# Altium PCB 0060631C.PcbDoc (part 1 of 7)
Units mil, origin at the board's own origin, x right, y up, seen from the top; angles counter-clockwise.
Board outline 5480 x 8249 mil, 6 copper layers (Top Layer, Mid-Layer 1, Mid-Layer 2, Internal Plane 1, Internal Plane 2, Bottom Layer); 514 components, 269 nets, 1375 pads, 1334 vias.
Unrouted connection lines stored in the file: 126.
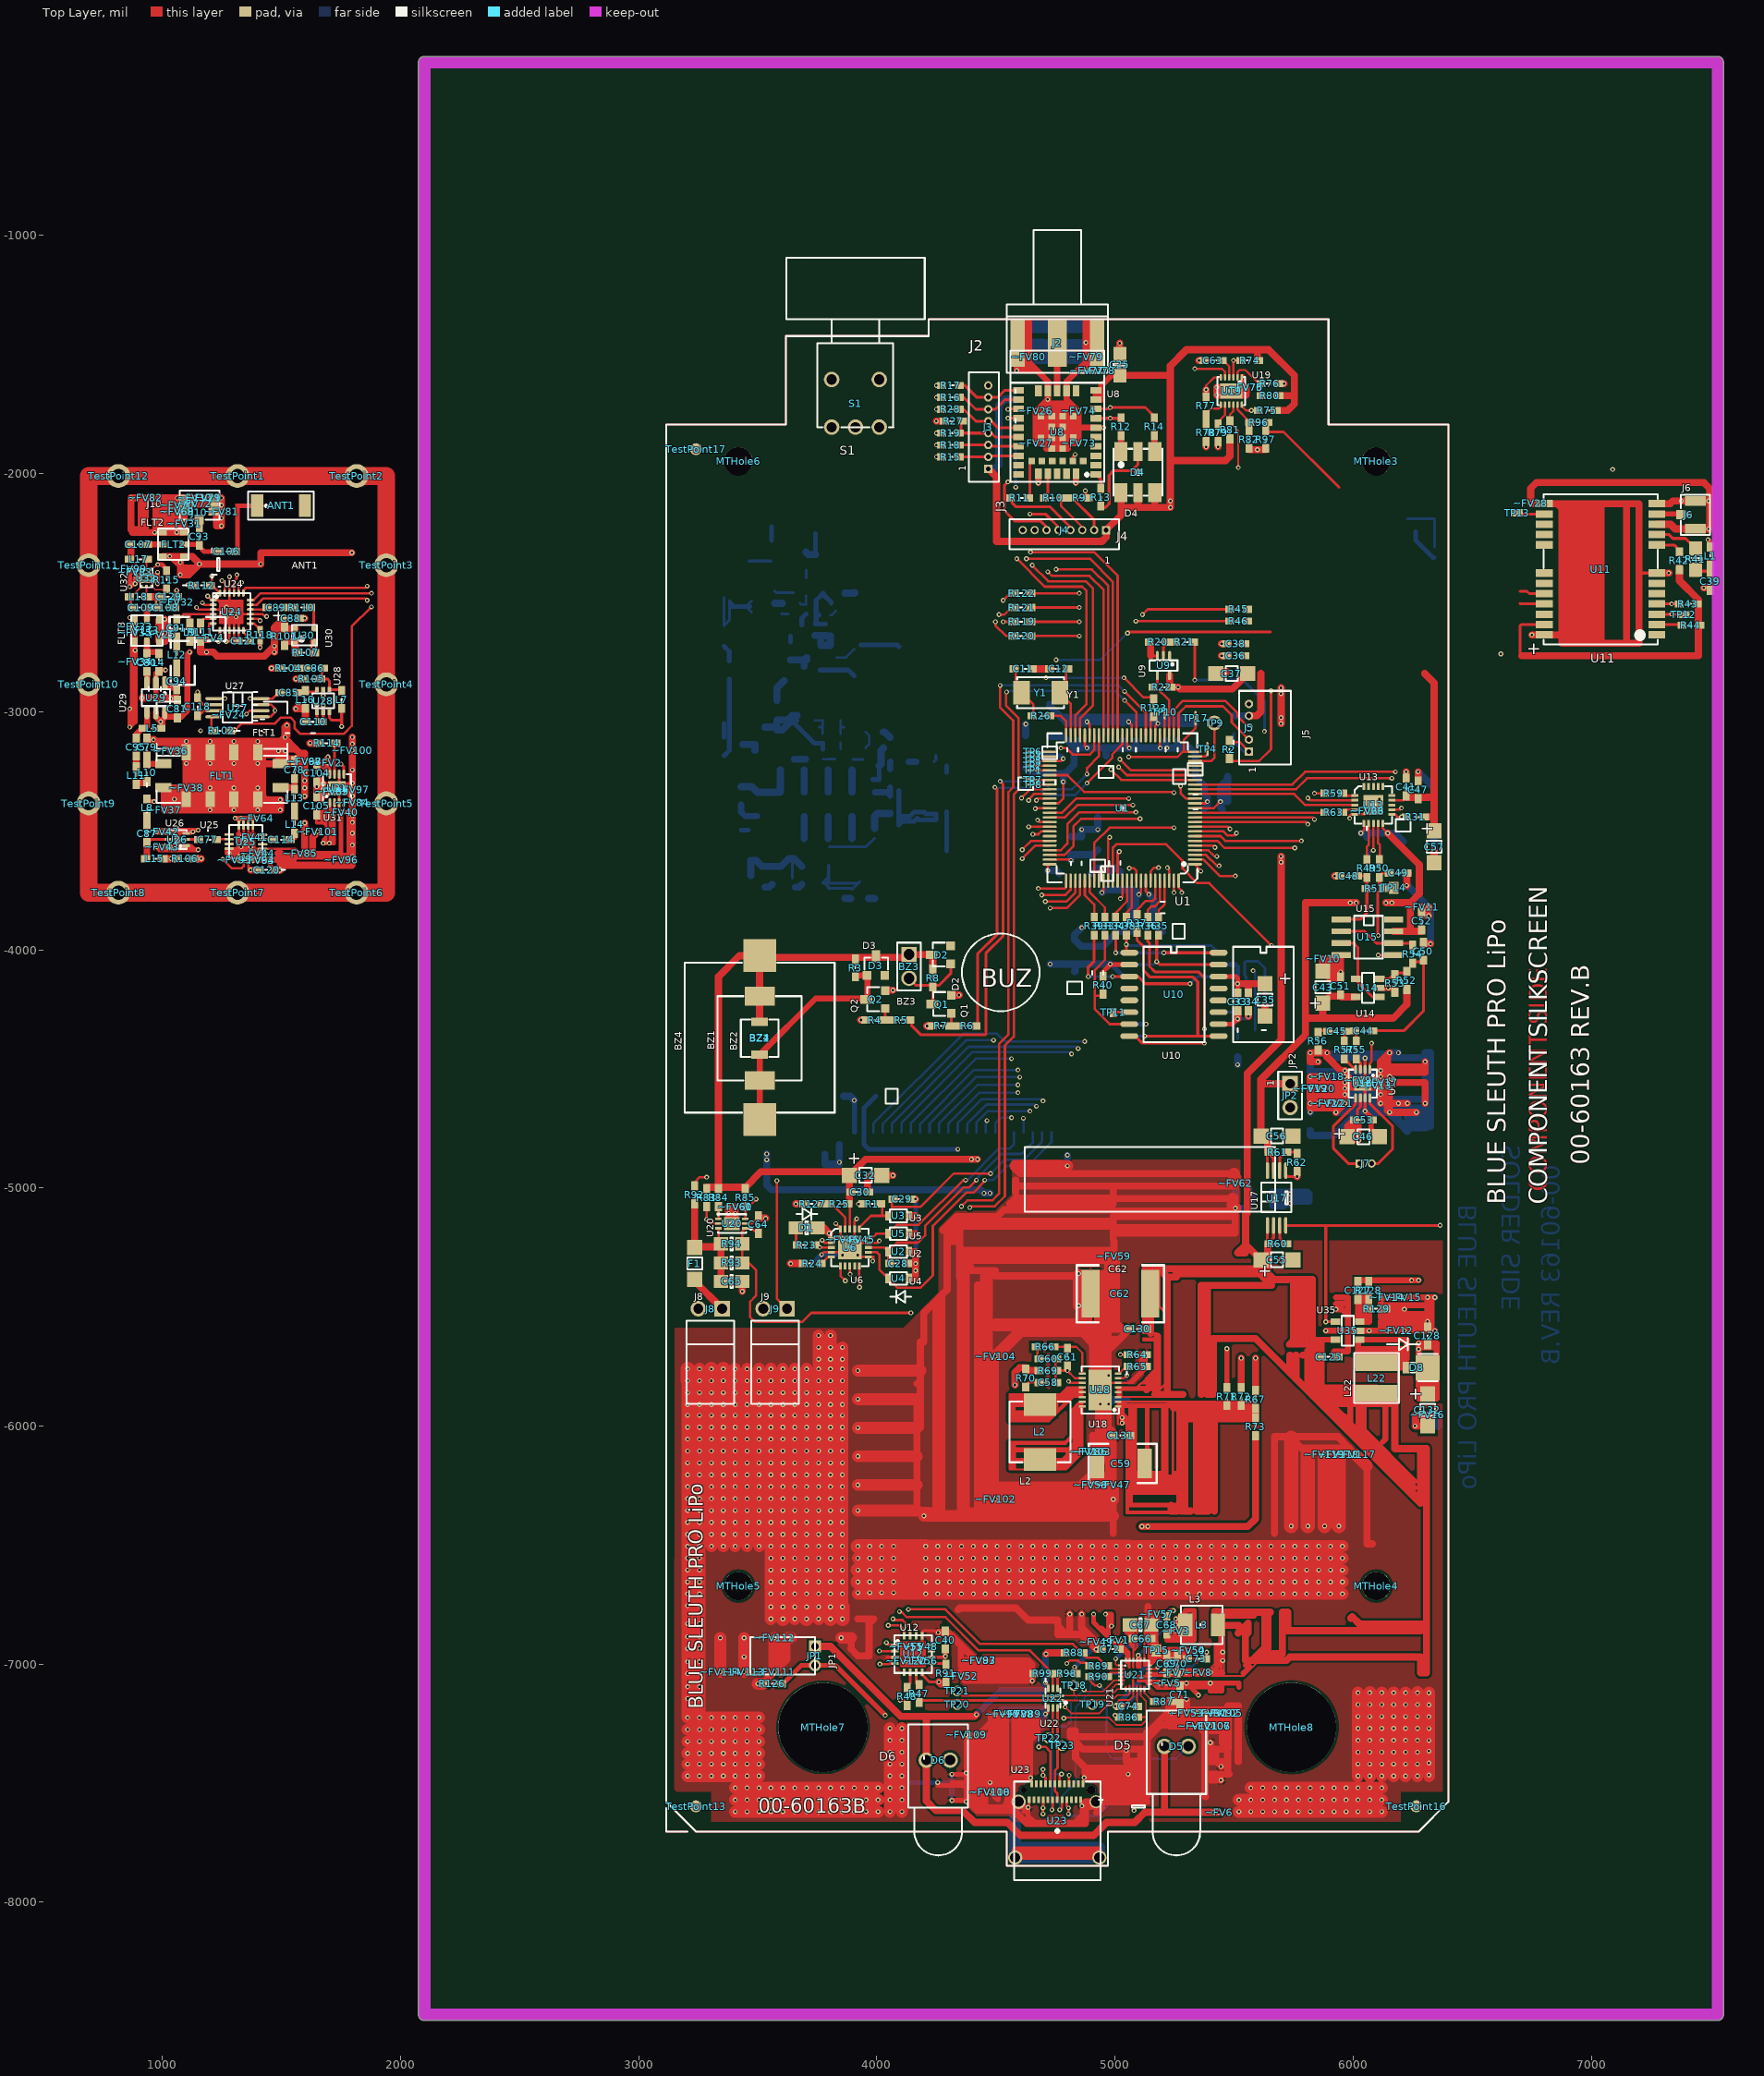
[diagram p0: Top Layer view]
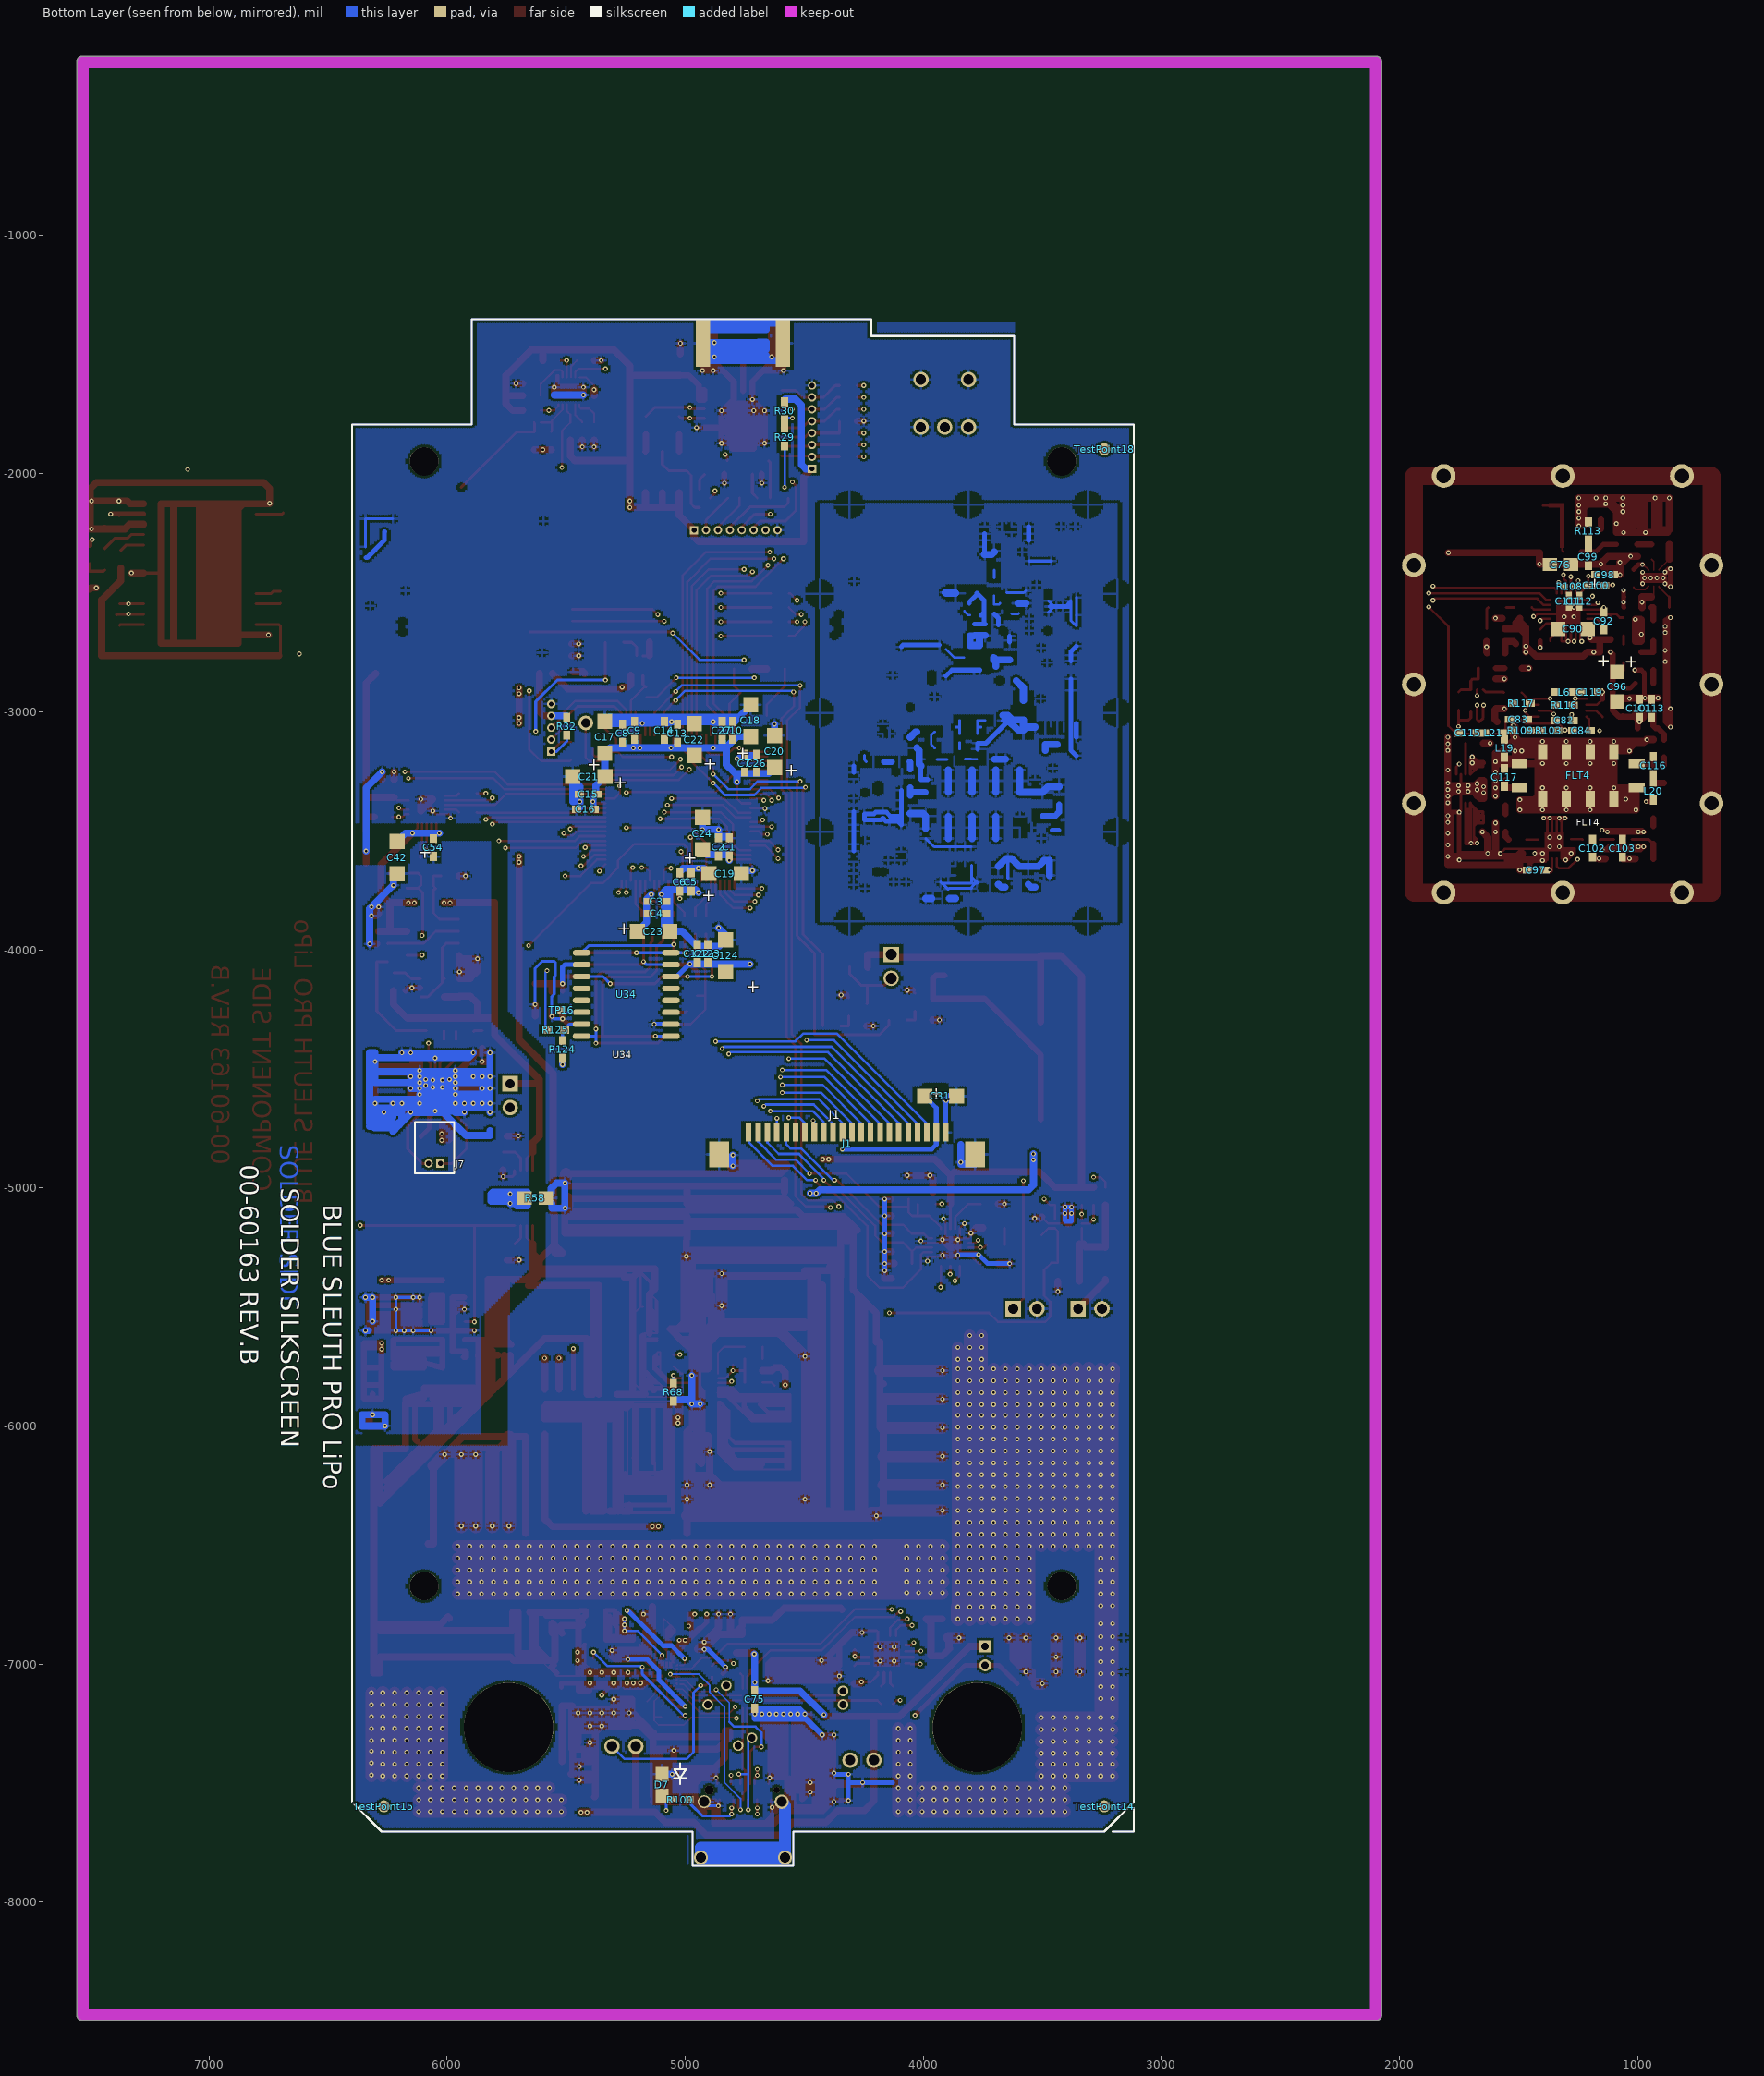
[diagram p1: Bottom Layer view, seen from below]
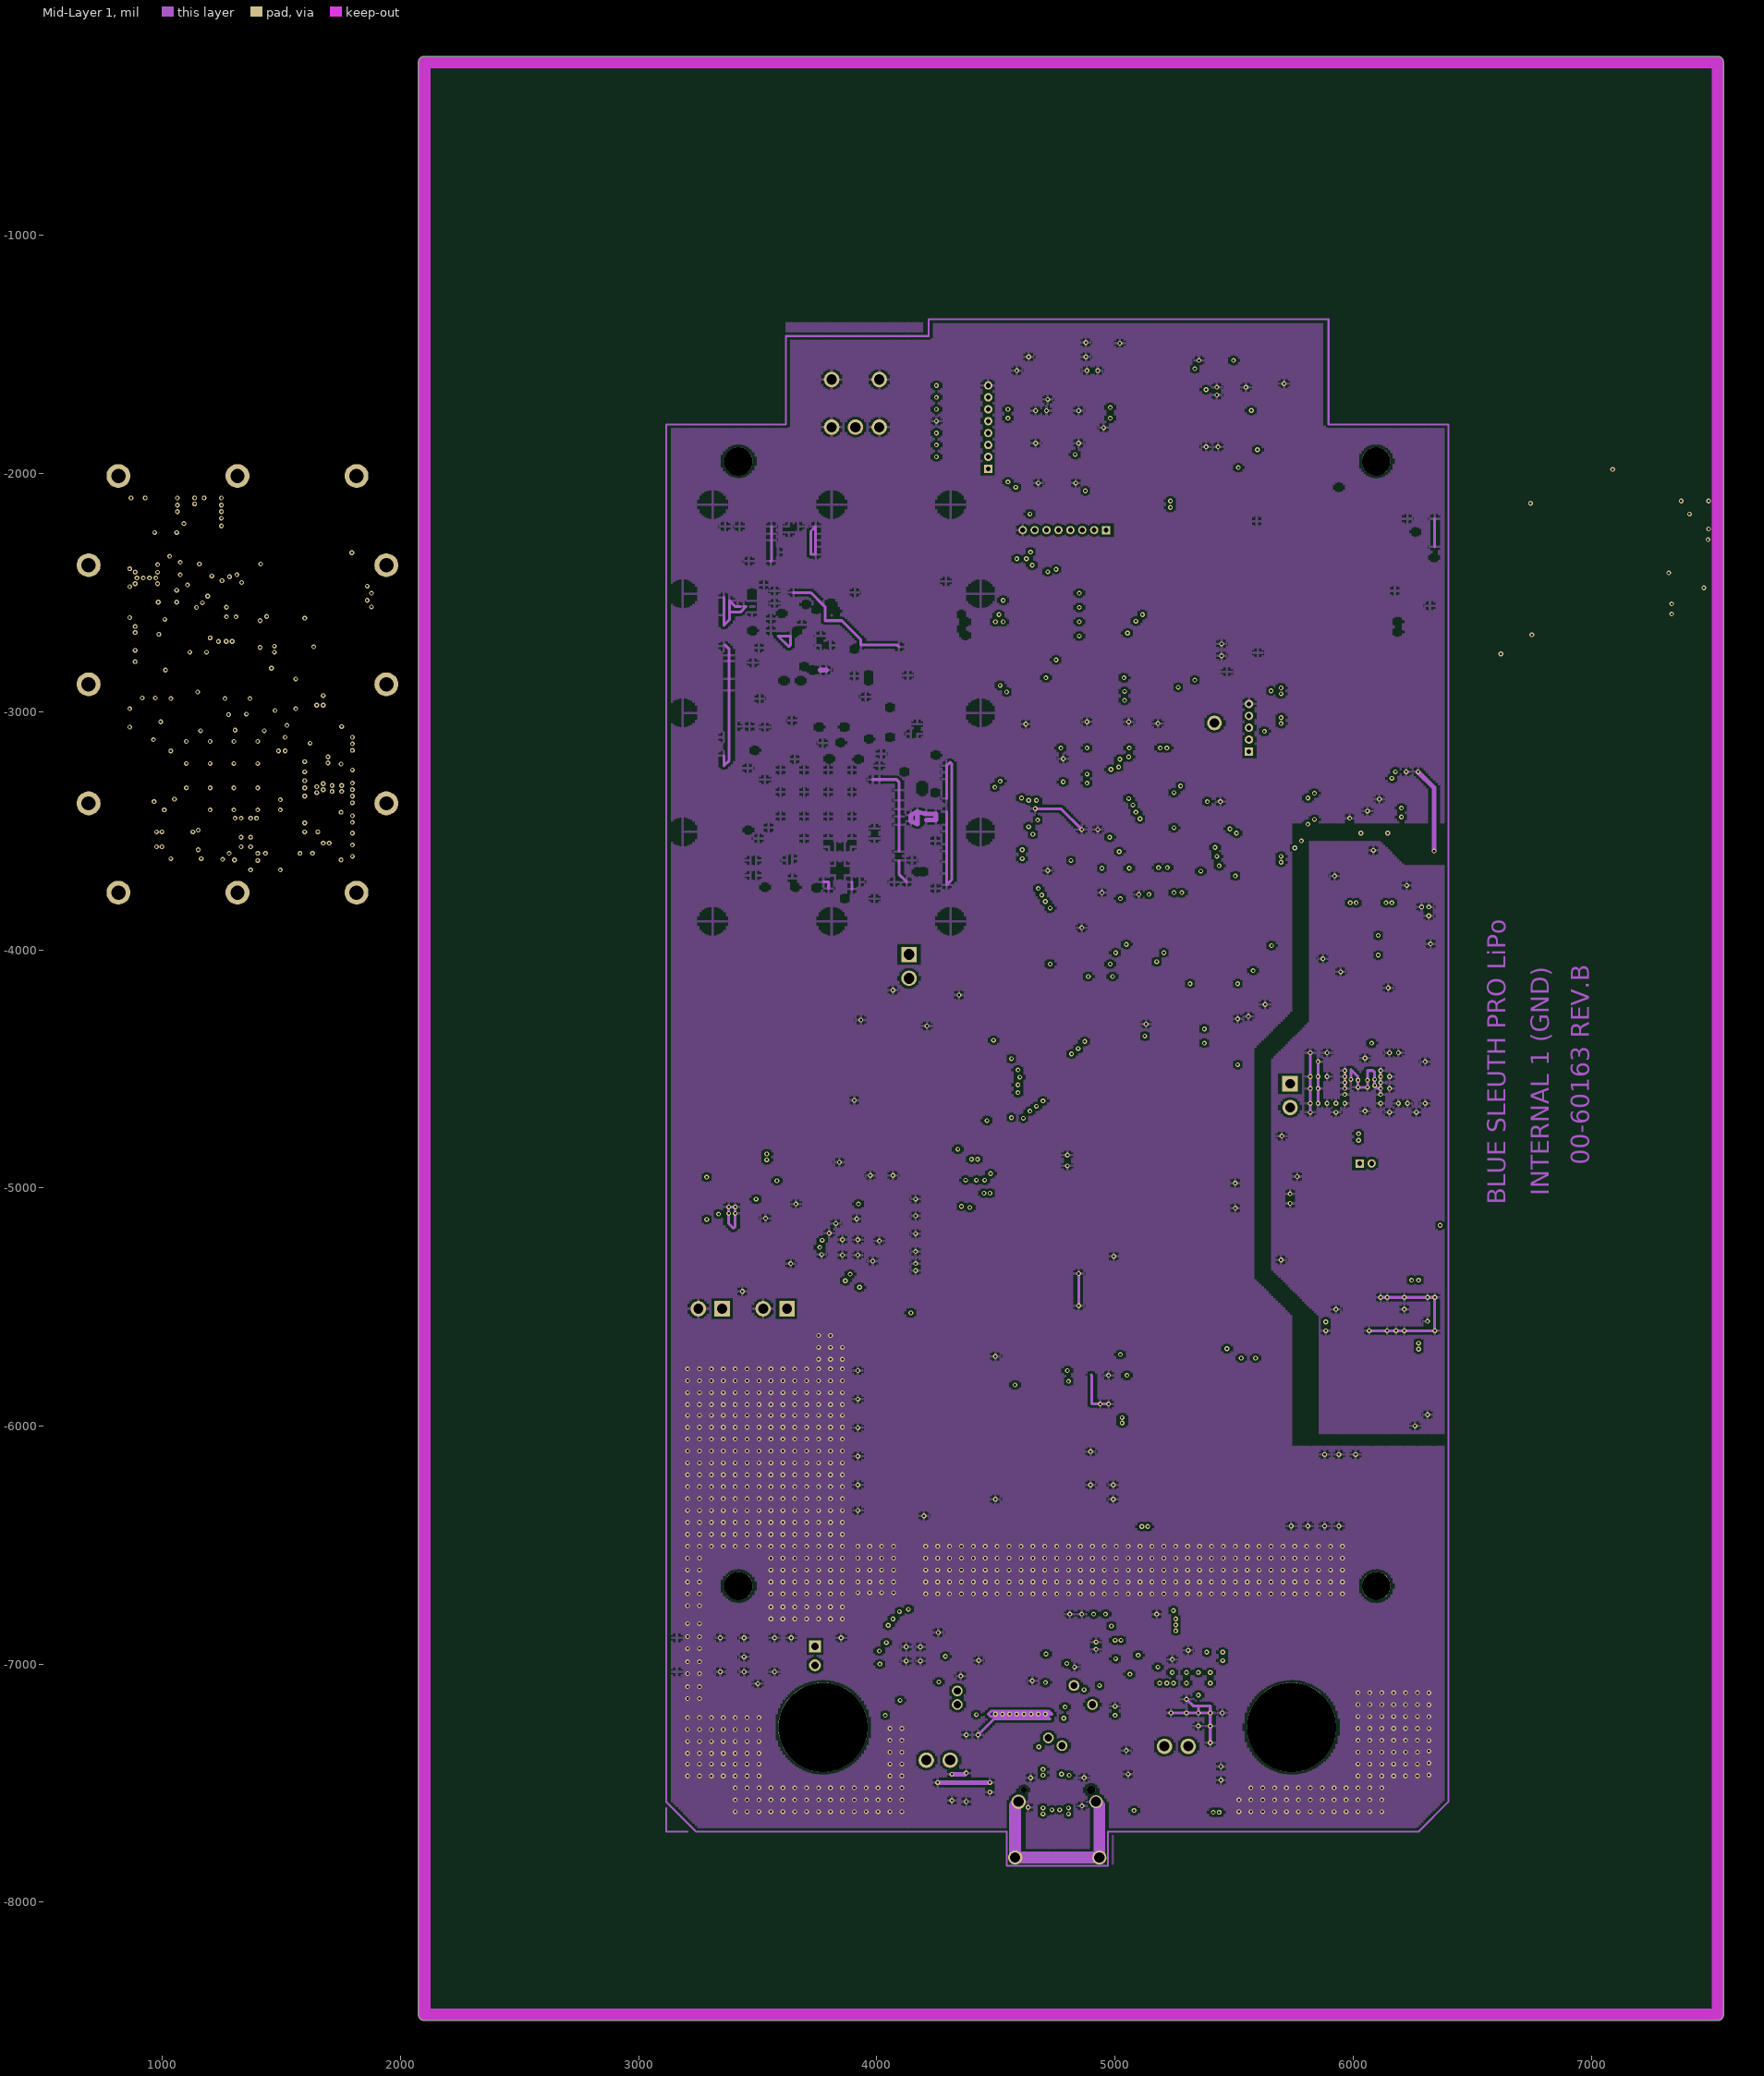
[diagram p2: Mid-Layer 1]
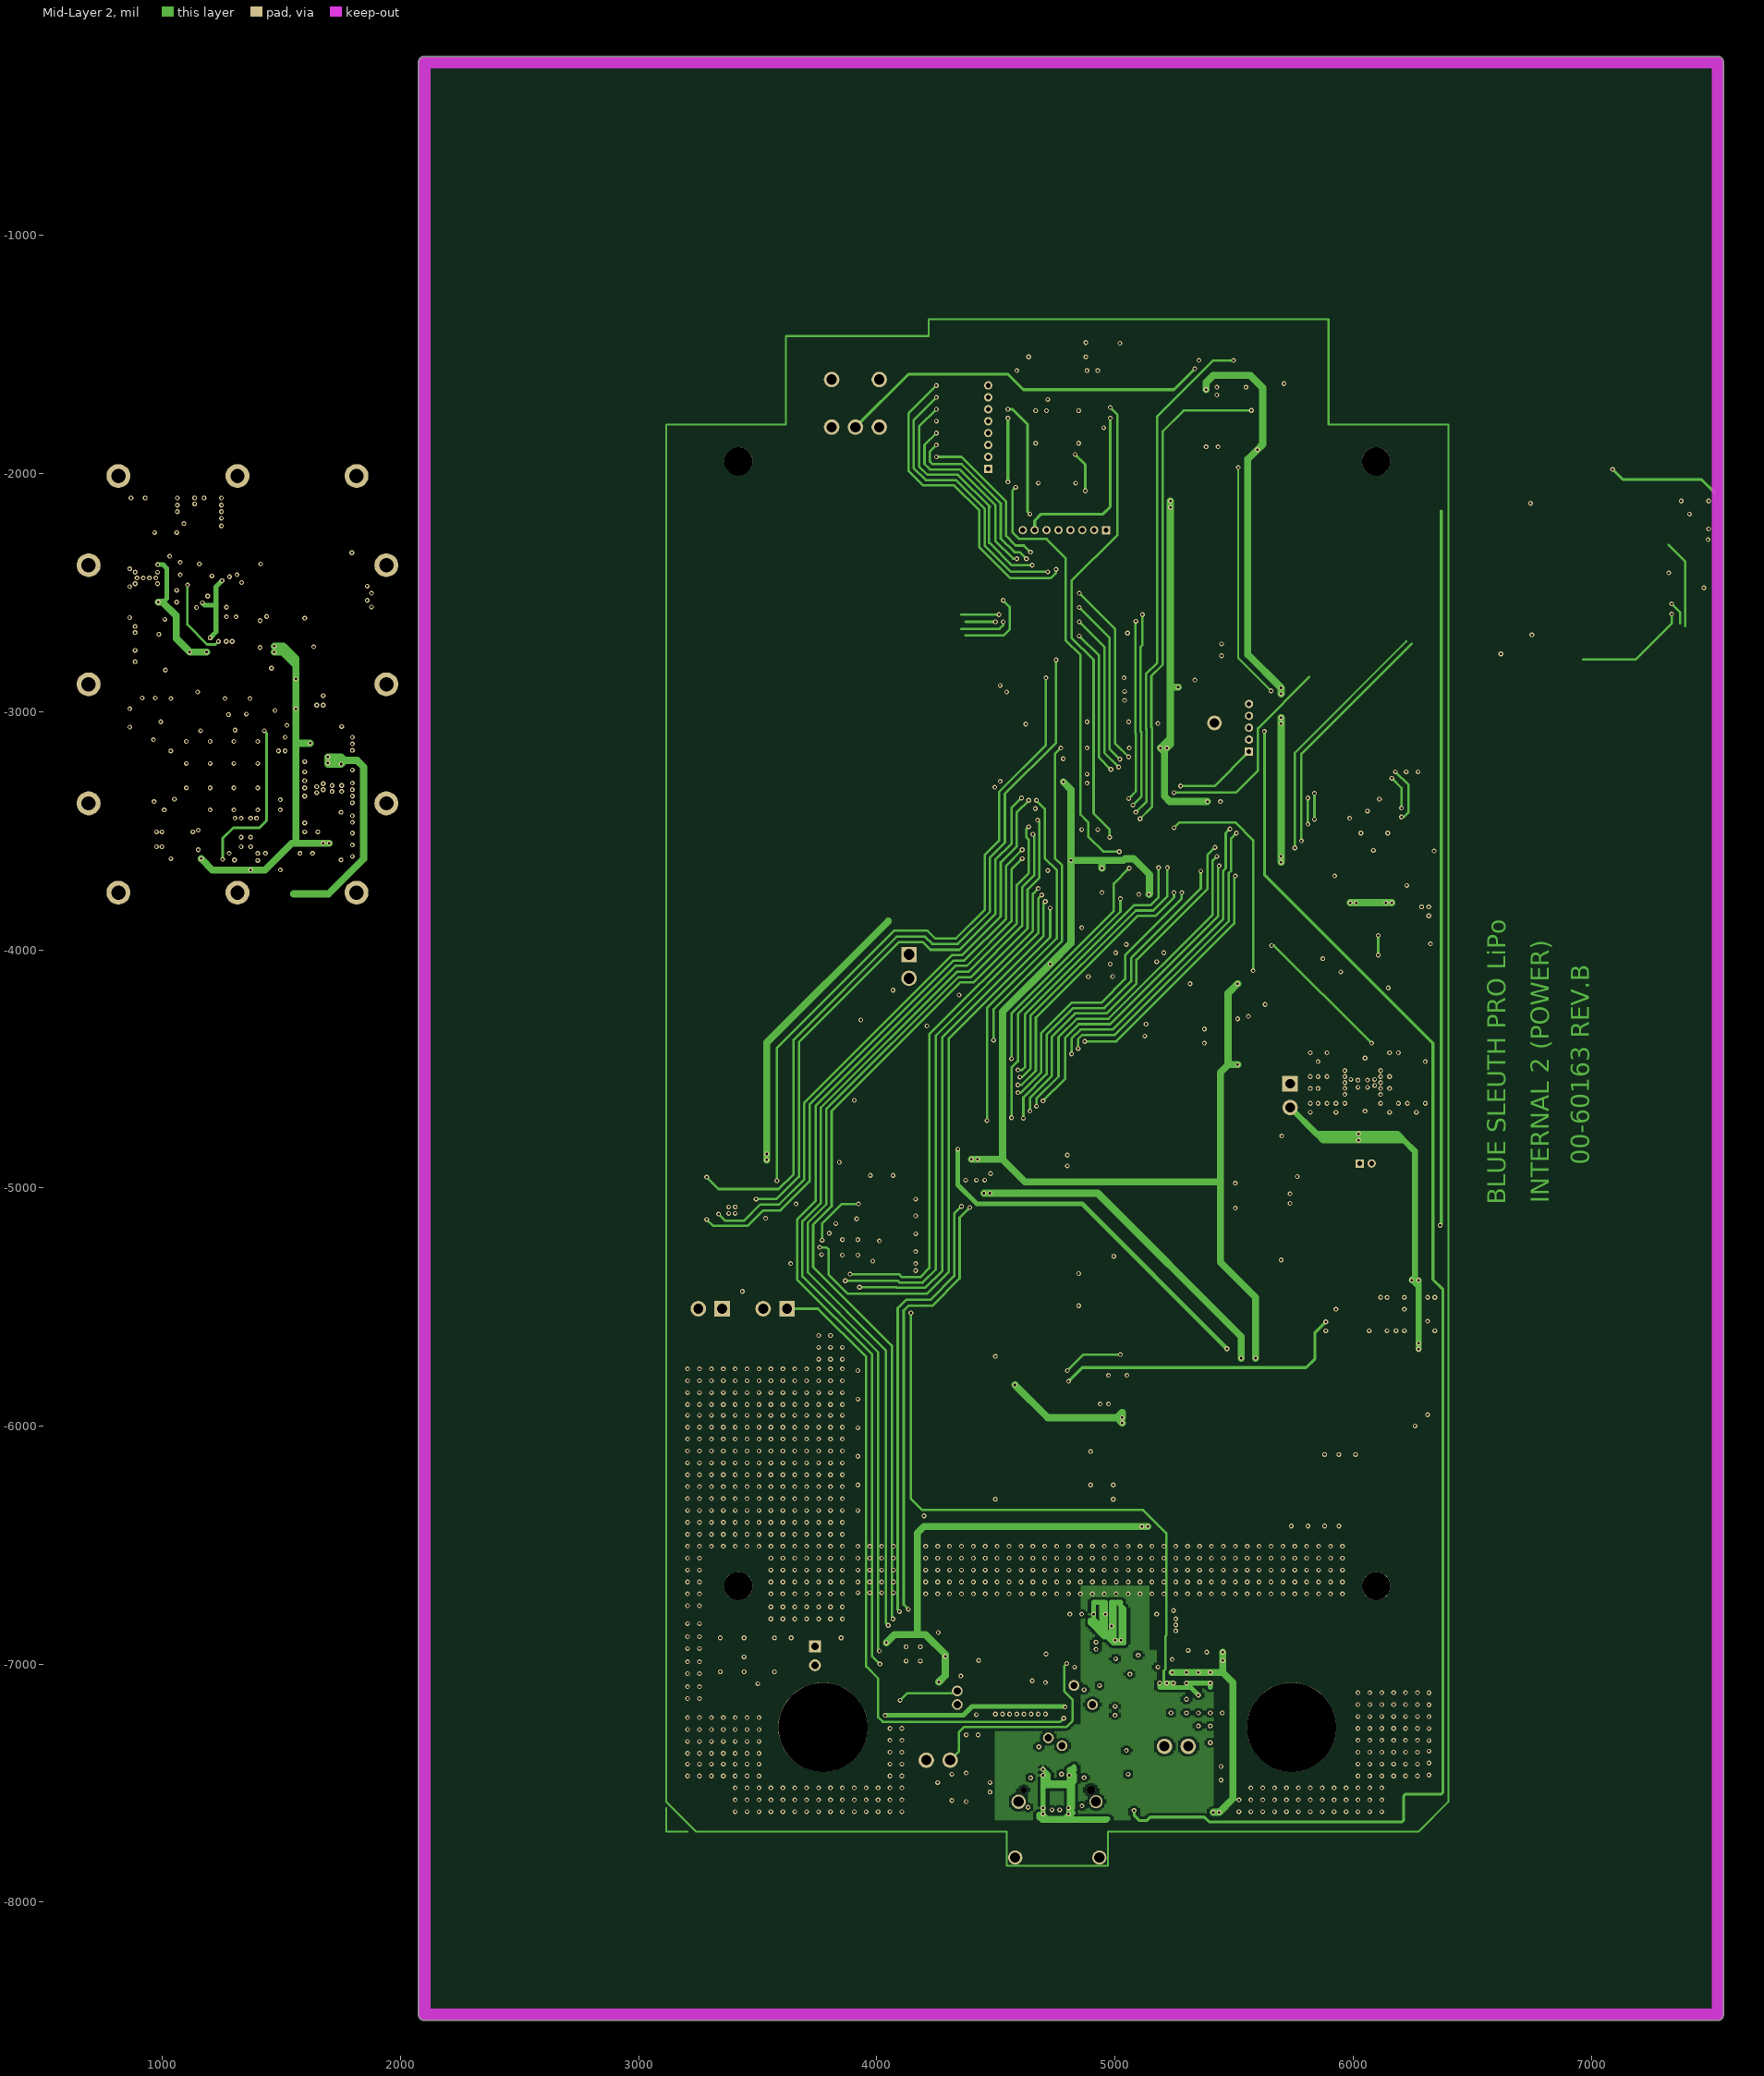
[diagram p3: Mid-Layer 2]
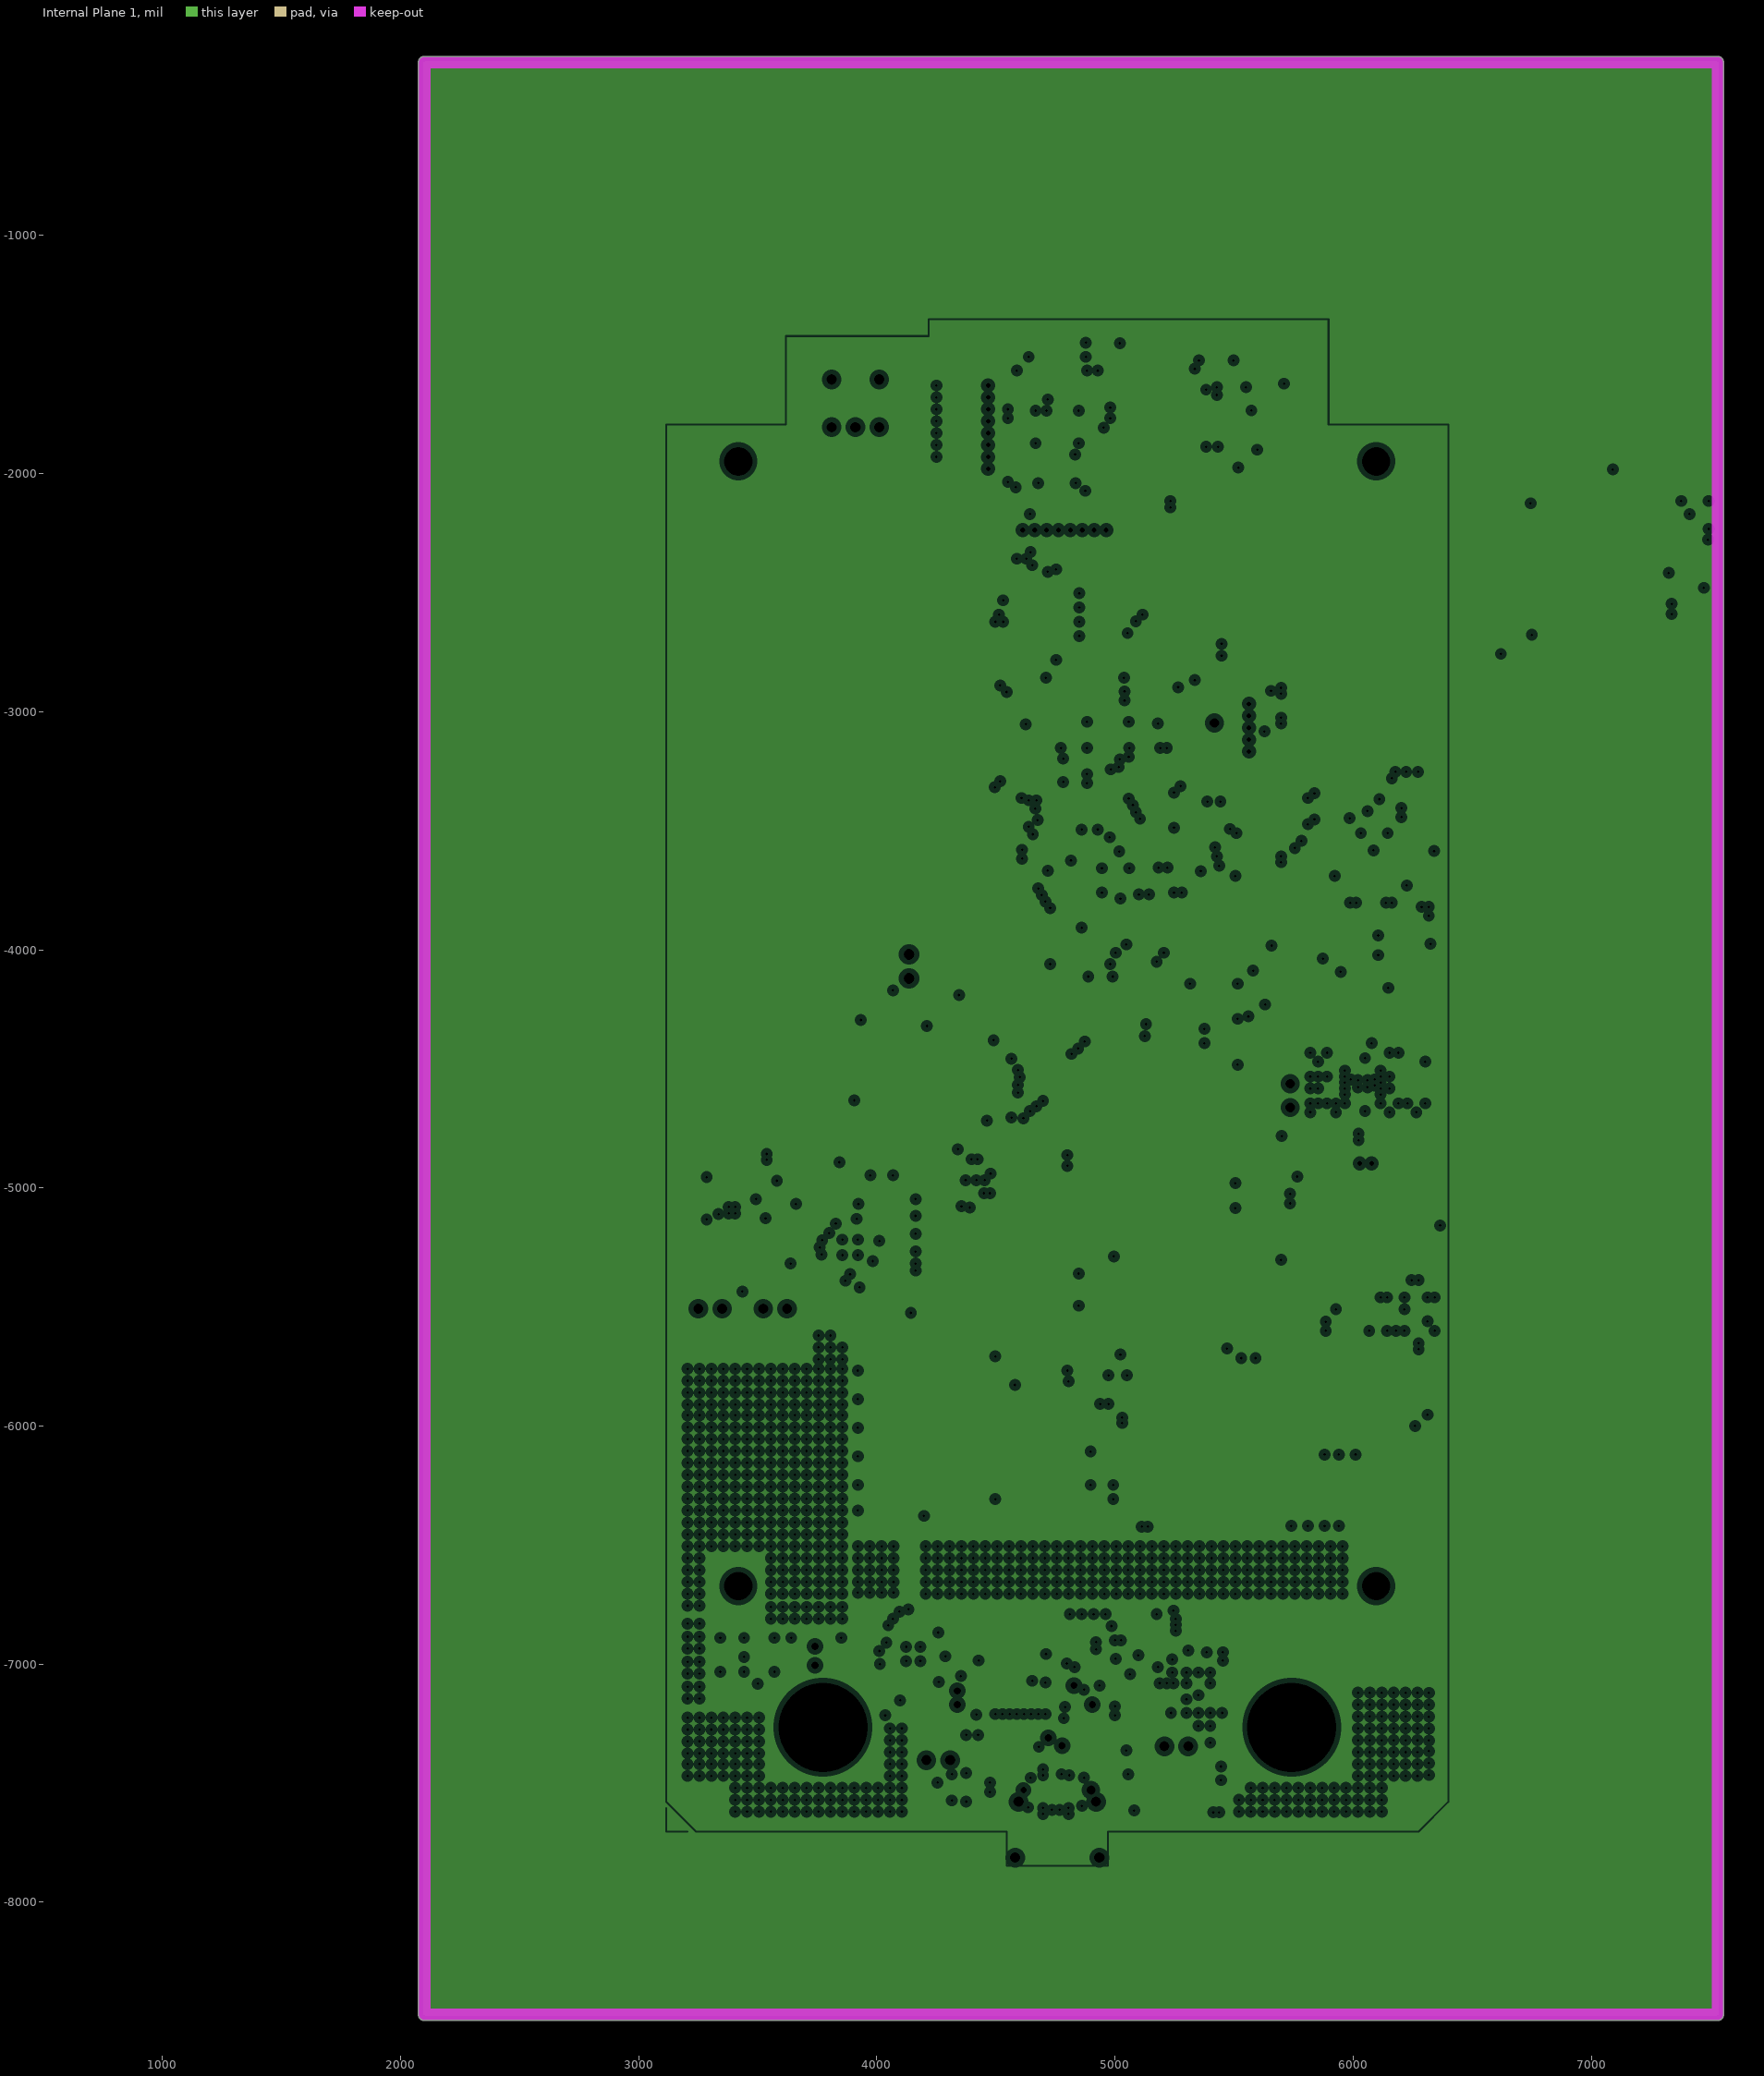
[diagram p4: Internal Plane 1, clearances drawn from the general rule]
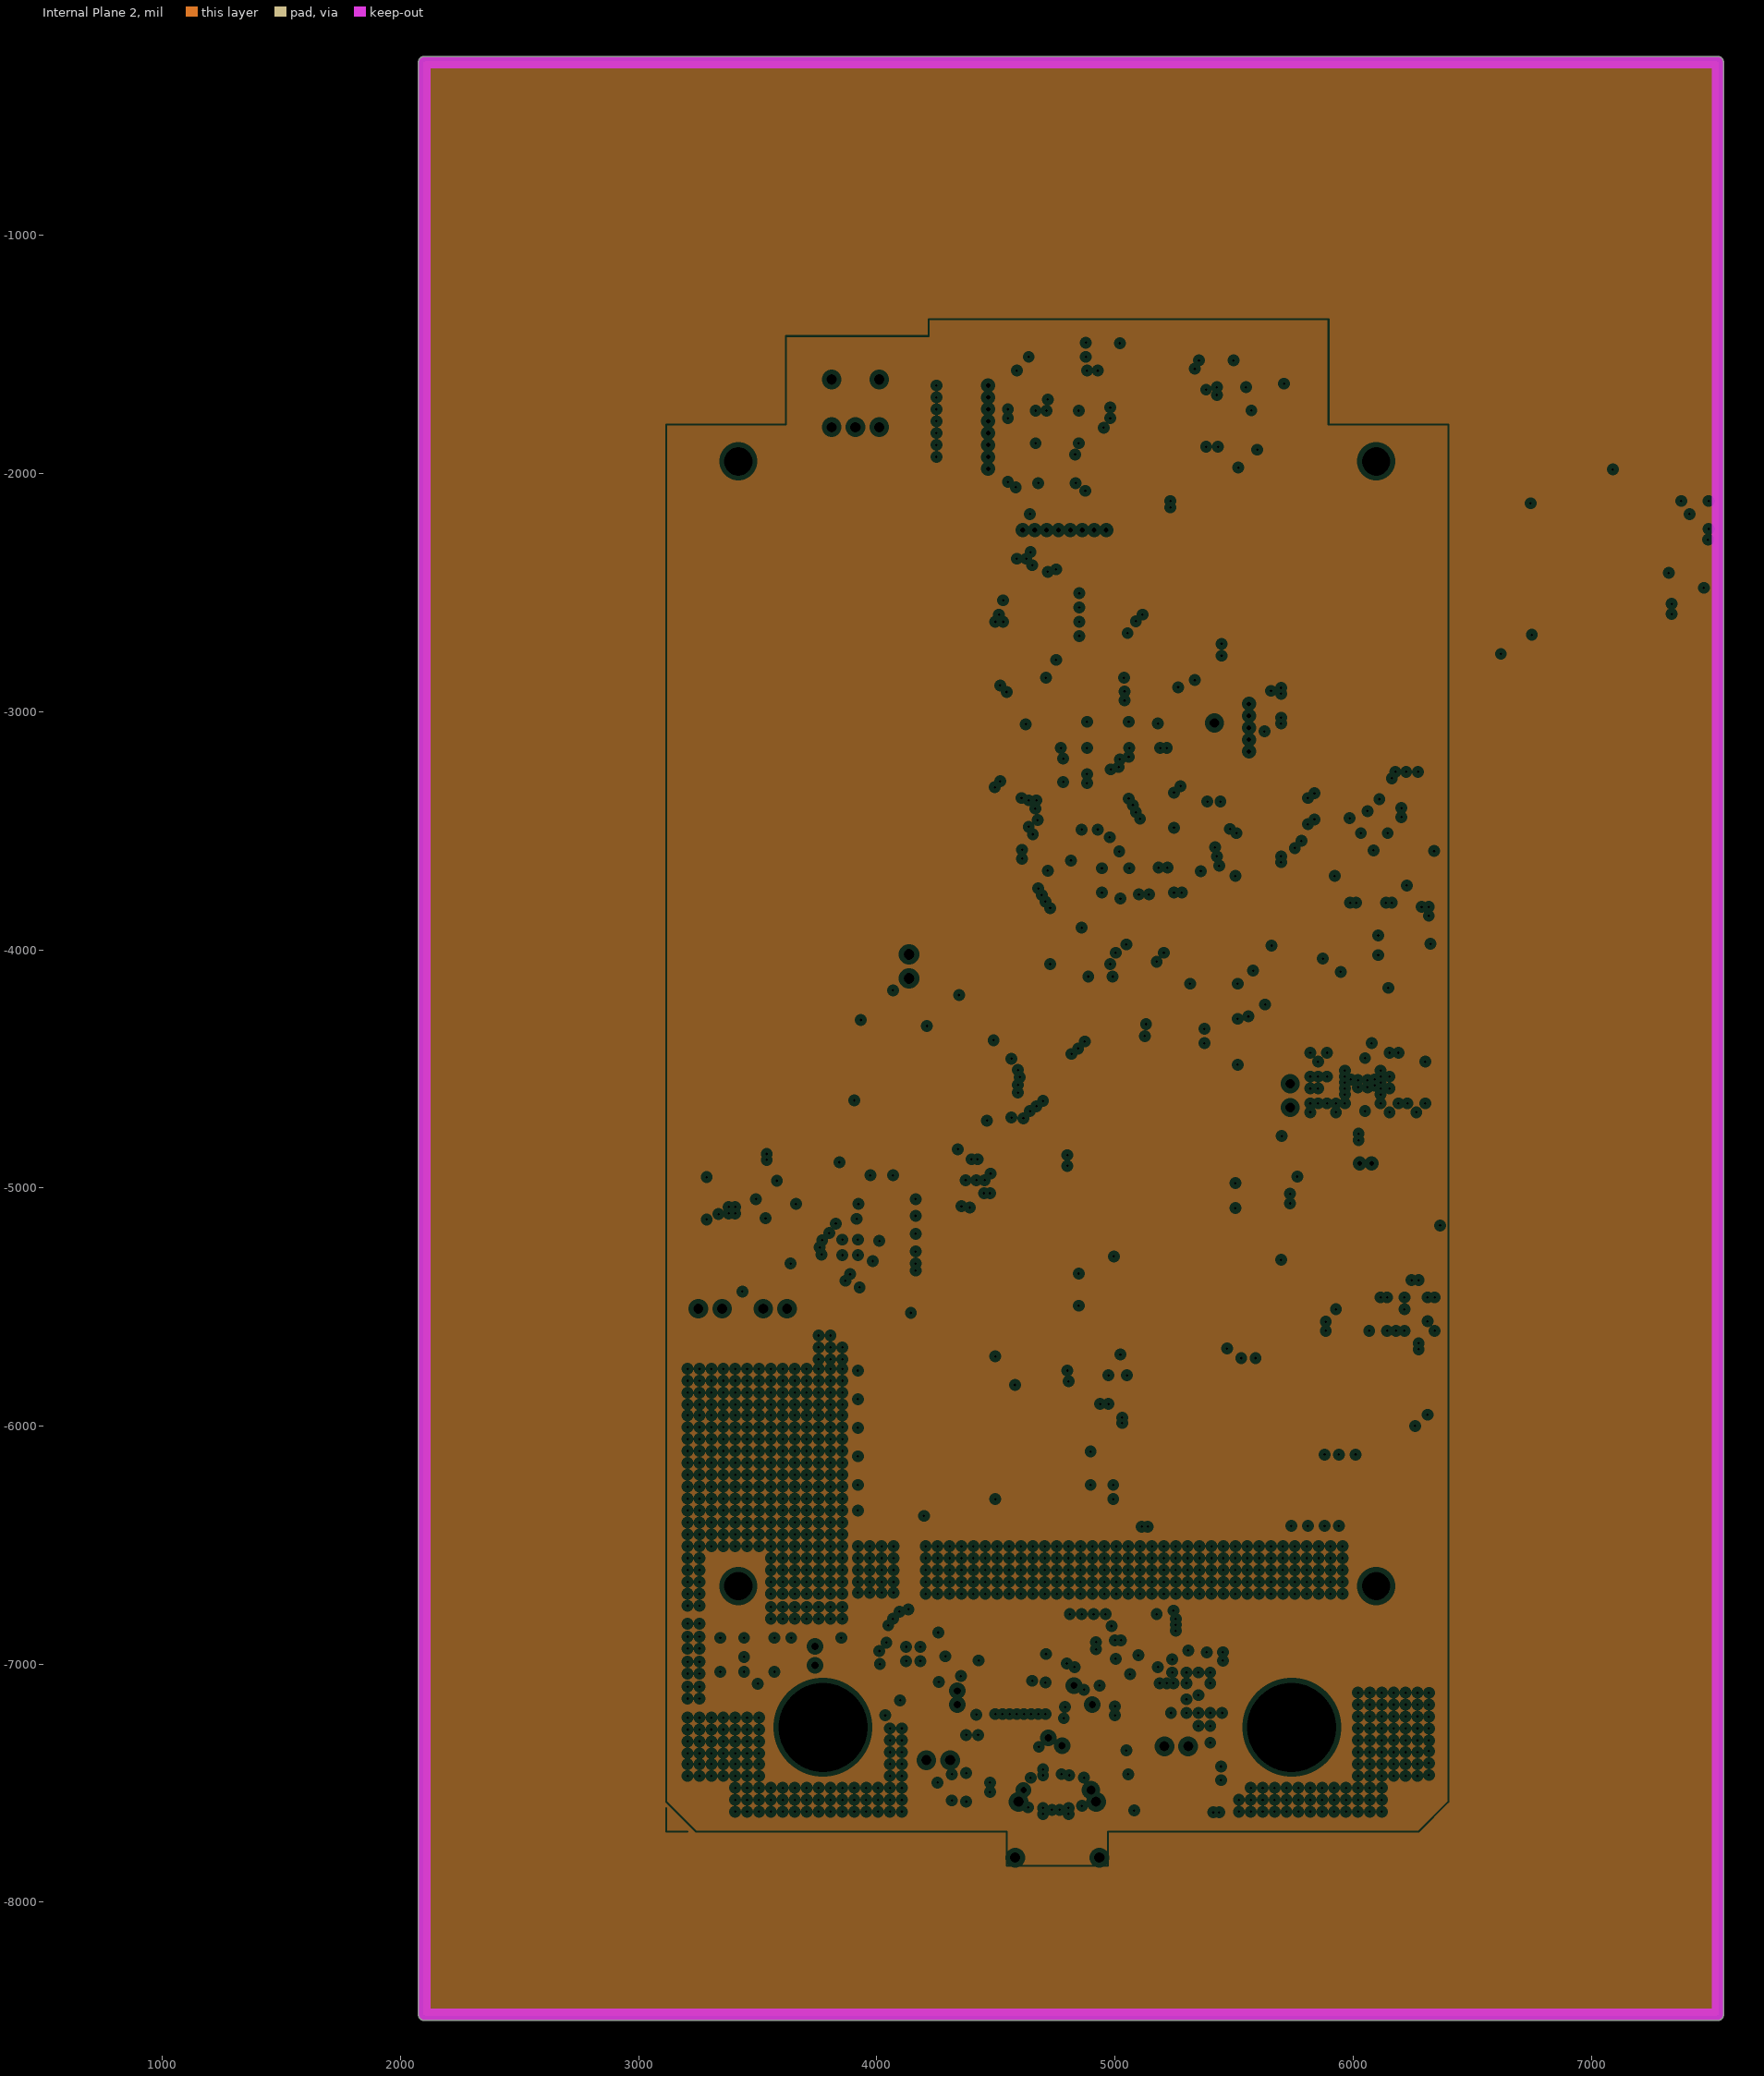
[diagram p5: Internal Plane 2, clearances drawn from the general rule]

## Layer stack, top to bottom
Top Solder: solder mask 0.4, Solder Resist, Dk 3.5
Top Layer: signal copper 1.4
Dielectric 1: dielectric 12.6, FR-4, Dk 4.8
Mid-Layer 1: signal copper 1.4
Dielectric4: dielectric 12.6, FR-4, Dk 4.8
Mid-Layer 2: signal copper 1.4
Dielectric5: dielectric 12.6, FR-4, Dk 4.8
Internal Plane 1: plane copper 1.4
Dielectric2: dielectric 12.6, FR-4, Dk 4.8
Internal Plane 2: plane copper 1.4
Dielectric3: dielectric 12.6, FR-4, Dk 4.8
Bottom Layer: signal copper 1.4
Bottom Solder: solder mask 0.4, Solder Resist, Dk 3.5

## Board outline
2075,-8472 2075,-273 cw(c2100,-273) 2100,-248 7530,-248 cw(c7530,-273) 7555,-273 7555,-8472 cw(c7530,-8472) 7530,-8497 2100,-8497 cw(c2100,-8472)

## Design rules (kind name [scope] priority, off if disabled: settings)
Clearance [All] p1: gap=10 ignorepadtopadclearanceinfootprint=FALSE
PasteMaskExpansion [All] p1: expansion=33
PlaneClearance [All] p1: clearance=20
PlaneConnect Plane_ConnectStyle_1 [(Name = 'TP9-1') Or (Name = 'TP12-1') Or (Name = 'TP13-1') Or (Name = 'BZ3-2')] p1: planeconnectstyle=Relief reliefexpansion=50 reliefentries=4 reliefconductorwidth=15 reliefairgap=100
PlaneConnect [All] p2: planeconnectstyle=Relief reliefexpansion=25 reliefentries=4 reliefconductorwidth=12 reliefairgap=10
PolygonConnect [All] p1: connectstyle=Relief reliefconductorwidth=10 reliefentries=4 polygonreliefangle="90 Angle" airgapwidth=10
RoutingVias [All] p1: holewidth=28 width=50 viastyle="Through Hole" minholewidth=28 minwidth=50 maxholewidth=28 maxwidth=50
SolderMaskExpansion [All] p1: expansion=0 istentingtop=FALSE
Width Net_Width_10 [InNet('N00120') Or InNet('N00197') Or InNet('N00171') Or InNet('N00113') Or InNet('N00191') Or InNet('N00174')] p1: maxlimit=12 minlimit=12 preferedwidth=12
Width Net_Width_9 [InNet('N00117') Or InNet('N00121') Or InNet('N00118') Or InNet('N00111')] p2: maxlimit=50 minlimit=50 preferedwidth=50
Width Net_Width_8 [InNet('SCKT_1') Or InNet('SDOT_1') Or InNet('SDIT_1') Or InNet('LCD_RST_1')] p3: maxlimit=15 minlimit=15 preferedwidth=15
Width Net_Width_7 [InNet('N00003') Or InNet('NINA_TX_1') Or InNet('N00040')] p4: maxlimit=100 minlimit=100 preferedwidth=100
Width Net_Width_6 [InNet('VBUS') Or InNet('IRQT_1') Or InNet('DISP_ON_1') Or InNet('BL_EN_1') Or InNet('PGEC2_1') Or InNet('PGED2_1') Or InNet('LCD_A0_1') Or InNet('LCD_CS_1') Or InNet('PC_TX_1') Or InNet('PC_RX_1') Or InNet('PC_RTS_1') Or InNet('PC_CTS_1')] p5: maxlimit=15 minlimit=15 preferedwidth=15
Width Net_Width_5 [InNet('NINA_DTR_1') Or InNet('NINA_RTS_1') Or InNet('NINA_RX_1') Or InNet('N00020') Or InNet('NINA_DSR_1') Or InNet('N00018') Or InNet('N00009') Or InNet('N00043') Or InNet('N00010') Or InNet('N00095') Or InNet('N00041') Or InNet('NINA_CTS_1')] p6: maxlimit=100 minlimit=100 preferedwidth=100
Width Net_Width_4 [InNet('N00063') Or InNet('N00064') Or InNet('N00052') Or InNet('N00081') Or InNet('N00068') Or InNet('AL/CC_1') Or InNet('N00175') Or InNet('N00168') Or InNet('N00129') Or InNet('N00185') Or InNet('N00182') Or InNet('N00135')] p7: maxlimit=20 minlimit=20 preferedwidth=20
Width Net_Width_3 [InNet('GND') Or InNet('N00076') Or InNet('N00087') Or InNet('N00085') Or InNet('N00067') Or InNet('N00080') Or InNet('N00091') Or InNet('N00103') Or InNet('N00059') Or InNet('N00072') Or InNet('FIELDGND') Or InNet('N00123') Or InNet('N00128')] p8: maxlimit=12 minlimit=12 preferedwidth=12
Width Net_Width_2 [InNet('N00025') Or InNet('N00047') Or InNet('N00048') Or InNet('INTA_1') Or InNet('N00027') Or InNet('N00060') Or InNet('SCKA_1') Or InNet('SDOA_1') Or InNet('SDIA_1') Or InNet('SSBA_1') Or InNet('RDYA_1') Or InNet('SHUTDOWN_1') Or InNet('N00116')] p9: maxlimit=50 minlimit=50 preferedwidth=50
Width Net_Width_1 [InNet('+3.3V') Or InNet('N00097') Or InNet('XL_1') Or InNet('N00104') Or InNet('BEEP_1') Or InNet('BUZZ_1') Or InNet('N00105') Or InNet('N00001')] p10: maxlimit=30 minlimit=30 preferedwidth=30
Width [All] p11: maxlimit=10 minlimit=10 preferedwidth=10
27 further rules are at their usual default settings.

## Components (designator, comment, footprint, x,y, rotation, side; value= is the part's Value field where it differs from the comment)
ANT1 "NN01-004" NN01-004 1397.5,-2135 r0 top
BZ1 "BEEPER" SMT-0940 3507.5,-4195 r180 top
BZ2 "BUZZER" ST-0402S 3507.5,-4302.5 r270 top
BZ3 "2CON" 2SIP100 4135,-4020 r270 top
BZ4 "BUZZER" CMT-1604 3507.5,-4025 r270 top
C1 ".01UF" 0603N#1 4815,-3600 r90 bottom
C2 ".1UF" 0603N#1 4860,-3600 r90 bottom
C3 ".01UF" 0603N#2 5162.5,-3797.5 r0 bottom
C4 ".1UF" 0603N#2 5162.5,-3847.5 r0 bottom
C5 ".01UF" 0603N#2 4975,-3672.5 r90 bottom
C6 ".1UF" 0603N#2 5022.5,-3672.5 r90 bottom
C7 ".01UF" 0603N#2 4750,-3260 r270 bottom
C8 ".1UF" 0603N#1 5262.5,-3122.5 r90 bottom
C9 ".01UF" 0603N#2 5212.5,-3122.5 r270 bottom
C10 ".1UF" 0603N#2 4800,-3122.5 r270 bottom
C11 "22PF" 0603N#3 4582.5,-2820 r180 top
C12 "22PF" 0603N#3 4795,-2820 r0 top
C13 ".1UF" 0603N#1 5032.5,-3122.5 r90 bottom
C14 ".01UF" 0603N#2 5087.5,-3122.5 r270 bottom
C15 ".1UF" 0603N#1 5375,-3347.5 r0 bottom
C16 ".01UF" 0603N#2 5375,-3410 r180 bottom
C17 "10UFT,6.3V" RC1206#1 5337.5,-3175 r270 bottom
C18 "10UFT,6.3V" RC1206#1 4725,-3105 r270 bottom
C19 "10UFT,6.3V" RC1206#1 4900,-3680 r0 bottom
C20 "10UFT,6.3V" RC1206#1 4625,-3235 r270 bottom
C21 "10UFT,6.3V" RC1206#1 5337.5,-3272.5 r180 bottom
C22 "10UFT,6.3V" RC1206#2 4962.5,-3185 r90 bottom
C23 "10UFT,6.3V" RC1206#1 5200,-3922.5 r0 bottom
C24 "10UFT,6.3V" RC1206#1 4927.5,-3580 r270 bottom
C25 "22UFC,6.3V" RC0805#1 5020,-1587.5 r90 top
C26 ".1UF" 0603N#2 4700,-3260 r270 bottom
C27 ".01UF" 0603N#2 4845,-3122.5 r270 bottom
C28 "0.01UF" 0603N#4 4047.5,-5317.5 r0 top
C29 "0.01UF" 0603N#4 4062.5,-5047.5 r0 top
C30 "0.1UF" 0603N#4 3885,-5017.5 r0 top
C31 "10UFT/6.3V" RC1206#1 3995,-4615 r0 bottom
C32 "10UFT/6.3V" RC1206#2 3885,-4947.5 r0 top
C33 "0.01UF" 0603N#4 5515,-4175 r270 top
C34 ".1_UF" 0603N#4 5560,-4175 r270 top
C35 "10UFT,6.3V" RC1206#2 5630,-4142.5 r270 top
C36 "4.7UF/6.3V" 0603N#4 5550,-2765 r180 top
C37 "4.7UF_T,10V" RC1206#2 5557.5,-2840 r180 top
C38 ".1_UF" 0603N#4 5550,-2715 r180 top
C39 "47PF" 0603N#4 7500,-2410 r270 top
C40 "0.1UF" 0603N#4 4287.5,-6942.5 r90 top
C41 ".001UF" 0603N#4 6222.5,-3360 r90 top
C42 "10UFT,16V_" RC1206#1 6210,-3545 r90 bottom
C43 "1UFT,16V" RC1206#2 5872.5,-4225 r90 top
C44 ".047UF" 0603N#4 6087.5,-4340 r180 top
C45 ".047UF" 0603N#4 5887.5,-4342.5 r0 top
C46 "10UFT,16V" RC1206#2 5975,-4785 r0 top
C47 "0.01UF" 0603N#3 6272.5,-3360 r270 top
C48 "0.01UF" 0603N#4 6025,-3690 r180 top
C49 "0.01UF" 0603N#4 6232.5,-3677.5 r180 top
C50 "0.01UF" 0603N#4 6295,-4050 r90 top
C51 "0.1UF" 0603N#4 5947.5,-4195 r90 top
C52 "0.1UF" 0603N#4 6287.5,-3922.5 r90 top
C53 "0.1UF" 0603N#4 6000,-4715 r0 top
C54 ".1UF" 0603N#2 6057.5,-3527.5 r90 bottom
C55 "1UFT,16V" RC1206#2 5612.5,-5302.5 r0 top
C56 "10UFC,10V_" RC1206#2 5612.5,-4782.5 r0 top
C57 "4.7UFT,16V" RC1206#2 6340,-3500 r270 top
C58 "47PF" 0603N#4 4674.9,-5817.5 r0 top
C59 "100UFC,6.3V" 1812 4932.4,-6157.5 r180 top
C60 "680PF" 0603N#4 4674.9,-5717.5 r0 top
C61 "12PF" 0603N#4 4799.9,-5667.5 r270 top
C62 "68UFC,10V" 2220 5147.4,-5445 r0 top
C63 ".1UF" 0603N#4 5455,-1525 r180 top
C64 ".1_UF" 0603N#4 3502.5,-5197.5 r90 top
C65 "22UFC,6.3V" RC0805#1 3345,-5392.5 r0 top
C66 "10UFC,16V" 0603N#4 5070,-6892.7 r0 top
C67 "22UFC,16V" RC0805#1 5062.5,-6835.2 r0 top
C68 ".1UF" 0603N#4 5217.5,-6792.7 r270 top
C69 "10UFC,10V" 0603N#4 5217.5,-7042.7 r90 top
C70 "10UFC,10V" 0603N#4 5262.5,-7042.7 r90 top
C71 "10UFC,10V" 0603N#4 5272.5,-7085.2 r270 top
C72 "2.2UFC,16V" 0603N#4 5022.5,-6937.7 r180 top
C73 "2.2UFC,16V" 0603N#4 5385,-6977.7 r180 top
C74 "2.2UFC,16V" 0603N#4 5100,-7177.7 r180 top
C75 ".1UF" 0603N#2 4707.6,-7105.1 r90 bottom
C76 "100UFT,6.3V" RC0805#2 1280,-2382.5 r180 bottom
C77 "2400PF" 0603N#4 1232.5,-3537.5 r180 top
C78 "6PF" 0603N#4 1555,-3287.5 r90 top
C79 "5PF" 0603N#4 935,-3192.5 r90 top
C80 "270PF" 0603N#4 935,-2750 r270 top
C81 "100PF" 0603N#4 1062.5,-2945 r270 top
C82 "3900PF" 0603N#2 1352.5,-3037.5 r0 bottom
C83 ".33UF" 0603N#2 1457.5,-3032.5 r180 bottom
C84 "1000PF" 0603N#2 1280,-3080 r0 bottom
C85 "22PF" 0603N#4 1487.5,-2920 r0 top
C86 "10PF" 0603N#4 1595,-2817.5 r0 top
C87 "2400PF" 0603N#4 935,-3555 r90 top
C88 "4.7UFT,16V" 0603N#4 1495,-2607.5 r0 top
C89 ".01UF" 0603N#4 1520,-2562.5 r180 top
C90 "10UFT,6.3V" 1206 1210,-2652.5 r180 bottom
C91 "1.5PF" 0603N#4 1060,-2605 r270 top
C92 ".1UF" 0603N#2 1142.5,-2662.5 r270 bottom
C93 "10PF" 0603N#4 1155,-2307.5 r90 top
C94 "100PF" 0603N#4 1060,-2827.5 r270 top
C95 "15PF" 0603N#4 890,-3192.5 r90 top
C96 "10UFT,6.3V" 1206 1085,-2832.5 r90 bottom
C97 "1000PF" 0603N#2 1470,-3665 r0 bottom
C98 "25PF" 0603N#2 1182.5,-2425 r0 bottom
C99 "360PF" 0603N#2 1207.5,-2392.5 r270 bottom
C100 "12PF" 0603N#2 1132.5,-2470 r180 bottom
C101 "1000PF" 0603N#2 992.5,-2942.5 r90 bottom
C102 ".1UF" 0603N#2 1190,-3530 r90 bottom
C103 ".1UF" 0603N#2 1065,-3530 r90 bottom
C104 "10UFC,16V" 0603N#4 1647.5,-3215 r270 top
C105 "10UFC,16V" 0603N#4 1647.5,-3440 r90 top
C106 "10PF" 0603N#4 1312.5,-2327.5 r180 top
C107 "22PF" 0603N#4 942.5,-2297.5 r180 top
C108 ".01UF" 0603N#4 1057.5,-2562.5 r180 top
C109 "22PF" 0603N#4 867.5,-2562.5 r0 top
C110 "0.1UF" 0603N#4 1590,-3042.5 r0 top
C111 ".1UF_" 0402N#1 1290,-2560 r270 bottom
C112 "100_PF" 0402N#1 1245,-2560 r270 bottom
C113 "0.01UF" 0603N#2 942.5,-2942.5 r90 bottom
C114 "1000PF_" 0603N#4 1542.5,-3537.5 r180 top
C115 "2400PF_" 0603N#2 1670,-3090 r180 bottom
C116 "6PF_" 0603N#2 935,-3270 r270 bottom
C117 "5PF_" 0603N#2 1560,-3232.5 r90 bottom
C118 "3900PF_" 0603N#4 1147.5,-3022.5 r90 top
C119 "22PF_" 0603N#2 1245,-2917.5 r0 bottom
C120 "0.1UF" 0603N#4 1395,-3665 r0 top
C121 "1000_PF" 0402N#2 1367.5,-2702.5 r180 top
C122 "0.01UF" 0603N#2 4950,-4060 r270 bottom
C123 ".1_UF" 0603N#2 4905,-4060 r270 bottom
C124 "10UFT,6.3V" RC1206#1 4830,-4092.5 r270 bottom
C125 "4.7UFC,6.3V" 0603N#4 5855,-5710 r0 top
C127 "150PF" 0603N#4 6020,-5387.5 r270 top
C128 "20UFC,6.3V" 0603N#4 6312.5,-5665 r90 top
C129 "100PF" 0603N#4 982.5,-2517.5 r0 top
C130 "1UFC,10V" 0603N#4 5137.4,-5592.5 r180 top
C131 "1UFC,10V" 0603N#4 5067.4,-6040 r180 top
C132 "100uFT,10V" RC1206#2 6312.5,-5865 r270 top
D1 "LED_GRN" RC0805#1 3660,-5167.5 r0 top
D2 "MMBD914" SOT23 4310,-4070 r90 top
D3 "MMBD914" SOT23 3947.5,-4107.5 r0 top
D4 "SMTL6-RGB" SMP6-RGB 5025,-1907.5 r0 top
D5 "LED_550" LED_550 5207.5,-7345.5 r0 top
D6 "LED_550" LED_550 4207.5,-7403.5 r0 top
D7 "BZY55C4V7RBG" RC0805#1 5097.5,-7552.5 r90 bottom
D8 "MBRM120" DO_216AA 6312.5,-5755 r0 top
F1 "5A" RC1206#2 3235,-5385 r90 top
FLT1 "TB0505A" SAW_TB0505A#1 1100,-3367.5 r90 top
FLT2 "TA0223A" TA0281A 1090,-2297.5 r90 top
FLT3 "TA0223A" TA0281A 935,-2615 r180 top
FLT4 "TB0505A_" SAW_TB0505A#2 1100,-3170 r90 bottom
J1 "CON22" CONN_FFC22 4733.5,-4767 r0 bottom
J2 "SMA" SMA_EDGE 4757.5,-1452.5 r0 top
J3 "CON8" 8CON50 4467.5,-1980 r90 top
J4 "CON8" 8CON50 4962.5,-2237.5 r180 top
J5 "5CON" 5CON50R 5562.5,-3167.5 r90 top
J6 "UMC" CONN_UMCX 7437.5,-2115 r180 top
J7 "2CON_" 2CON50R 6077.5,-4897.5 r0 top
J8 "2_CON" 2CON100R 3250,-5507.5 r0 top
J9 "CON_2" 2CON100R 3522.5,-5507.5 r0 top
J10 "UMCX" CONN_UMCX 1097.5,-2132.5 r270 top
JP1 "JUMPER" 2CON79R 3740,-7005 r90 top
JP2 "JUMPER" JUMPER 5735,-4562.5 r270 top
L1 "27NH" 0603N#4 7500,-2302.5 r270 top
L2 "2.2UH" IND_IHLP 4684.9,-5910 r0 top
L3 ".47UH" IND_SRP 5295,-6835.2 r270 top
L4 "2.2NH" 0603N#4 985,-2750 r270 top
L5 "330NH" 0603N#4 1000,-3070 r180 top
L6 "430NH" 0603N#2 1352.5,-2917.5 r0 bottom
L7 "180NH" 0603N#4 1752.5,-2992.5 r90 top
L8 "47NH" 0603N#4 935,-3447.5 r90 top
L9 "47NH" 0603N#4 1115,-2622.5 r270 top
L10 "390NH" 0603N#4 935,-3300 r90 top
L11 "47NH" 0603N#4 890,-3225 r270 top
L12 "3.9NH" 0603N#4 1060,-2717.5 r270 top
L13 "390NH" 0603N#4 1555,-3320 r270 top
L14 "47NH" 0603N#4 1555,-3430 r270 top
L15 "180NH" 0603N#4 1010,-3617.5 r180 top
L16 "180NH" 0603N#4 1600,-2992.5 r90 top
L17 "2.2NH" 0603N#4 942.5,-2360 r180 top
L18 "3.3NH" 0603N#4 942.5,-2517.5 r180 top
L19 "390NH_" 0603N#2 1560,-3197.5 r270 bottom
L20 "390NH_" 0603N#2 935,-3377.5 r270 bottom
L21 "47NH_" 0603N#2 1562.5,-3090 r180 bottom
L22 "1.8UH" IND_CD43 6097.5,-5862.5 r180 top
MTHole3 "" MTHole3 6096.5,-1948.5 r0 top locked
MTHole4 "" MTHole4 6096.5,-6672.5 r0 top locked
MTHole5 "" MTHole5 3418.5,-6672.5 r0 top locked
MTHole6 "" MTHole6 3418.5,-1948.5 r0 top locked
MTHole7 "" MTHole7 3773.5,-7265.5 r0 top locked
MTHole8 "" MTHole8 5741.5,-7265.5 r0 top locked
Q1 "MMBT3904L" SOT23 4312.5,-4277.5 r90 top
Q2 "MMBT3904L" SOT23 4035,-4257.5 r90 top
R1 "20K" 0603N#4 4022.5,-5067.5 r180 top
R2 "10K" 0603N#4 5480,-3202.5 r90 top
R3 "390" 0603N#4 3910,-4032.5 r270 top
R4 "10K" 0603N#4 4035,-4295 r180 top
R5 "1K" 0603N#4 4145,-4295 r180 top
R6 "1K" 0603N#4 4422.5,-4320 r180 top
R7 "10K" 0603N#4 4312.5,-4320 r180 top
R8 "390" 0603N#4 4235,-4075 r270 top
R9 "0" 0603N#4 4895,-2102.5 r180 top
R10 "0" 0603N#4 4697.5,-2102.5 r0 top
R11 "0" 0603N#4 4642.5,-2102.5 r180 top
R12 "2K" 0603N#4 5025,-1760 r270 top
R13 "2K" 0603N#3 4940,-2067.5 r90 top
R14 "2K" 0603N#4 5165,-1760 r270 top
R15 "0" 0603N#4 4352.5,-1930 r180 top
R16 "0" 0603N#4 4352.5,-1680 r180 top
R17 "0" 0603N#4 4352.5,-1630 r180 top
R18 "0" 0603N#4 4352.5,-1880 r180 top
R19 "0" 0603N#4 4352.5,-1830 r180 top
R20 "3.30K" 0603N#4 5225,-2707.5 r180 top
R21 "2K" 0603N#4 5335,-2707.5 r180 top
R22 "1K" 0603N#4 5240,-2897.5 r180 top
R23 "4.7K" 0603N#4 3660,-5240 r0 top
R24 "0" 0603N#4 3685,-5317.5 r0 top
R25 "0" 0603N#4 3885,-5067.5 r180 top
R26 "4.7K" 0603N#4 4732.5,-3017.5 r180 top
R27 "1K" 0603N#3 4352.5,-1780 r0 top
R28 "0" 0603N#4 4352.5,-1730 r180 top
R29 "0.0" 0603N#1 4582.5,-1815 r270 bottom
R30 "10.0K" 0603N#2 4582.5,-1692.5 r90 bottom
R31 "10K" 0603N#4 6305,-3442.5 r180 top
R32 "1K_" 0603N#1 5497.5,-3092.5 r90 bottom
R33 "33" 0603N#4 4957.5,-3857.5 r270 top
R34 "33" 0603N#4 5002.5,-3857.5 r270 top
R35 "33" 0603N#4 5182.5,-3857.5 r270 top
R36 "33" 0603N#4 5137.5,-3857.5 r270 top
R37 "33" 0603N#3 5092.5,-3857.5 r90 top
R38 "33" 0603N#4 5047.5,-3857.5 r270 top
R39 "33" 0603N#4 4912.5,-3857.5 r270 top
R40 "100K_" 0603N#4 4950,-4192.5 r90 top
R41 "10,1%,1/4W" RC0805#1 7437.5,-2315 r270 top
R42 "4.7K_" 0603N#4 7370,-2322.5 r270 top
R43 "4.7K_" 0603N#4 7450,-2547.5 r180 top
R44 "4.7K" 0603N#4 7375,-2637.5 r0 top
R45 "0" 0603N#4 5475,-2570 r0 top
R46 "0" 0603N#4 5475,-2620 r0 top
R47 "27" 0603N#3 4177.5,-7092.5 r90 top
R48 "27" 0603N#4 4127.5,-7092.5 r270 top
R49 "1K,1%" 0603N#4 6057.5,-3615 r270 top
R50 "1K,1%" 0603N#4 6110,-3615 r270 top
R51 "680,1%" 0603N#4 6047.5,-3742.5 r0 top
R52 "82K,1%" 0603N#4 6225,-4172.5 r90 top
R53 "82K,1%" 0603N#4 6175,-4097.5 r270 top
R54 "1K" 0603N#4 6250,-3975 r270 top
R55 "100" 0603N#4 6012.5,-4377.5 r270 top
R56 "0" 0603N#4 5852.5,-4340 r270 top
R57 "100" 0603N#4 5962.5,-4377.5 r270 top
R58 "0_" RC0805#2 5675,-5042.5 r0 bottom
R59 "0" 0603N#4 5875,-3342.5 r0 top
R60 "100K" 0603N#4 5640,-5235 r0 top
R61 "18K,1%" 0603N#4 5640,-4850 r0 top
R62 "10K,1%" 0603N#4 5765,-4850 r270 top
R63 "0" 0603N#4 5875,-3422.5 r0 top
R64 "182K,1%" 0603N#4 5050,-5700 r0 top
R65 "90.9K,1%" 0603N#4 5050,-5750 r0 top
R66 "49.9K,1%" 0603N#4 4749.9,-5667.5 r180 top
R67 "0.0" 0603N#4 5590,-5845 r270 top
R68 "10_K" 0603N#2 5049.9,-5815 r90 bottom
R69 "825K,1%" 0603N#4 4674.9,-5767.5 r0 top
R70 "6.49K,1%" 0603N#4 4624.9,-5755 r270 top
R71 "0.0" 0603N#4 5470,-5920 r90 top
R72 "0.0" 0603N#4 5530,-5920 r90 top
R73 "0.0" 0603N#4 5590,-5960 r270 top
R74 "100K" 0603N#4 5522.5,-1525 r0 top
R75 "100K" 0603N#4 5682.5,-1735 r180 top
R76 "100K,1%" 0603N#4 5607.5,-1622.5 r0 top
R77 "499K,1%" 0603N#4 5382.5,-1672.5 r270 top
R78 "100K,1%" 0603N#4 5382.5,-1785 r270 top
R79 "100K,1%" 0603N#4 5432.5,-1785 r270 top
R80 "499K,1%" 0603N#4 5607.5,-1672.5 r0 top
R81 "100K" 0603N#4 5482.5,-1860 r90 top
R82 "100K" 0603N#4 5562.5,-1900 r90 top
R83 "2K" 0603N#4 3285,-4997.5 r270 top
R84 "2K" 0603N#4 3335,-4997.5 r270 top
R85 "2K" 0603N#4 3447.5,-4997.5 r270 top
R86 "10K" 0603N#4 5100,-7222.7 r180 top
R87 "14K,1%" 0603N#4 5160,-7157.5 r0 top
R88 "200K" 0603N#4 4785,-6952.5 r0 top
R89 "1K" 0603N#4 4887.5,-7007.5 r0 top
R90 "1K" 0603N#4 4887.5,-7052.5 r0 top
R91 "10K" 0603N#4 4290,-7082.5 r90 top
R92 "0" 0603N#4 3235,-5072.5 r90 top
R93 ".02,1/2W,1%" RC0805#1 3435,-5315 r180 top
R94 ".02,1/2W,1%" RC0805#1 3435,-5235 r180 top
R96 "0" 0603N#4 5560,-1785 r0 top
R97 "0" 0603N#4 5632.5,-1900 r90 top
R98 "10K" 0603N#4 4842.5,-7040 r180 top
R99 "10K" 0603N#4 4652.6,-7040.1 r0 top
R100 "1K" 0603N#2 4977.5,-7570 r180 bottom
R101 "5.1K" 0603N#4 1512.5,-2640 r270 top
R102 "180" 0603N#4 1205,-3080 r0 top
R103 "3K" 0603N#2 1330,-3080 r180 bottom
R104 "50" 0603N#4 1485,-2817.5 r0 top
R105 "1.5K" 0603N#4 1670,-2862.5 r180 top
R106 "10" 0603N#4 1137.5,-3617.5 r180 top
R107 "4.7K" 0603N#4 1557.5,-2752.5 r0 top
R108 "10K" 0402N#1 1262.5,-2475 r180 bottom
R109 "1.8K" 0603N#2 1447.5,-3080 r180 bottom
R110 "1K" 0603N#4 1627.5,-2562.5 r180 top
R111 "51" 0603N#4 1160,-2622.5 r270 top
R112 "27K" 0603N#4 1207.5,-2470 r180 top
R113 "12K" 0603N#2 1207.5,-2285 r270 bottom
R114 "100K" 0603N#4 1647.5,-3132.5 r0 top
R115 "1K" 0603N#4 1017.5,-2402.5 r270 top
R116 "1.0K" 0603N#2 1352.5,-2972.5 r0 bottom
R117 "10.0" 0603N#2 1532.5,-2965 r0 bottom
R118 "4.70K" 0402N#2 1410,-2655 r270 top
R119 "0" 0603N#4 4565,-2622.5 r0 top
R120 "0" 0603N#4 4565,-2682.5 r0 top
R121 "0" 0603N#4 4565,-2562.5 r0 top
R122 "0" 0603N#4 4565,-2502.5 r0 top
R123 "0" 0603N#4 5162.5,-2940 r270 top
R124 "100K" 0603N#2 5515,-4375 r90 bottom
R125 "33" 0603N#2 5587.5,-4337.5 r0 bottom
R126 "100K" 0603N#4 3605,-7082.5 r180 top
R127 "0" 0603N#4 3685,-5067.5 r0 top
R128 "29.4K" 0603N#4 6065,-5387.5 r270 top
R129 "10K" 0603N#4 6055,-5507.5 r0 top
S1 "SW_400A" SW_400A 3810,-1605 r0 top
TestPoint1 "" TestPoint1 1315,-2010 r0 top
TestPoint2 "" TestPoint2 1815,-2010 r0 top
TestPoint3 "" TestPoint3 1940,-2385 r0 top
TestPoint4 "" TestPoint4 1940,-2885 r0 top
TestPoint5 "" TestPoint5 1940,-3385 r0 top
TestPoint6 "" TestPoint6 1815,-3760 r0 top
TestPoint7 "" TestPoint7 1315,-3760 r0 top
TestPoint8 "" TestPoint8 815,-3760 r0 top
TestPoint9 "" TestPoint9 690,-3385 r0 top
TestPoint10 "" TestPoint10 690,-2885 r0 top
TestPoint11 "" TestPoint11 690,-2385 r0 top
TestPoint12 "" TestPoint12 815,-2010 r0 top
TestPoint13 "" TestPoint13 3240,-7597.5 r0 top
TestPoint14 "" TestPoint14 3240,-7597.5 r0 bottom
TestPoint15 "" TestPoint15 6265,-7597.5 r0 bottom
TestPoint16 "" TestPoint16 6265,-7597.5 r0 top
TestPoint17 "" TestPoint17 3240,-1897.5 r0 top
TestPoint18 "" TestPoint18 3240,-1897.5 r0 bottom
TP1 "TP1" TSTPT5#1 4655.5,-3247 r0 top
TP2 "TP1" TSTPT5#1 4655.5,-3227.3 r0 top
TP3 "TP1" TSTPT5#1 4655.5,-3187.9 r0 top
TP4 "TP1" TSTPT5#1 5387.5,-3157.5 r270 top
TP5 "TP1" TSTPT5#1 4655.5,-3207.6 r0 top
TP6 "TP1" TSTPT5#1 4655.5,-3168.2 r180 top
TP7 "TP1" TSTPT5#1 4655.5,-3286.4 r0 top
TP8 "TP1" TSTPT5#1 4655.5,-3306.1 r180 top
TP9 "TP1" TSTPT5#2 5417.5,-3047.5 r90 top
TP10 "TP1" TSTPT5#1 5207.9,-3002.1 r90 top
TP11 "TP1" TSTPT5#3 4992.5,-4257.5 r270 top
TP12 "TP1" TSTPT5#4 7387.5,-2592.5 r270 top
TP13 "TP1" TSTPT5#4 6687.5,-2165 r270 top
TP14 "TP1" TSTPT5#5 6170,-3740 r0 top
TP15 "TP_GND" TSTPT5#5 5172.5,-6942.7 r0 top
TP16 "TP1" TSTPT5#6 5525,-4252.5 r0 bottom
TP17 "TP1" TSTPT5#1 5337.5,-3027.5 r90 top
TP18 "TP1" TSTPT5#7 4827.5,-7090 r0 top
TP19 "TP1" TSTPT5#7 4905,-7170 r0 top
TP20 "TP1" TSTPT5#7 4337.5,-7170 r0 top
TP21 "TP1" TSTPT5#7 4337.5,-7112.5 r0 top
TP22 "TP1" TSTPT5#7 4720,-7310 r0 top
TP23 "TP1" TSTPT5#7 4777.5,-7342.5 r0 top
U1 "PIC32MZ2048EFG100" QFP100-4 5335.6,-3641 r180 top
U2 "PESD5V0S1BA" SOD323 4135,-5267.5 r180 top
U3 "PESD5V0S1BA" SOD323 4135,-5117.5 r180 top
U4 "PESD5V0S1BA" SOD323 4135,-5380 r180 top
U5 "PESD5V0S1BA" SOD323 4135,-5192.5 r180 top
U6 "AR1021I/ML" QFN20.4X4 3809,-5211 r270 top
U8 "NINA-B2" NINA-B221 4919.5,-2004 r180 top
U9 "SN74LVC1G07DCK" SC70_5 5177.5,-2847.5 r180 top
U10 "S25FL512S" SO16WB#1 5060,-4012.5 r0 top
U11 "NEO-7N" UBLOX_NEO-7N 7275,-2677.5 r90 top
U12 "FT230XQ-R" QFN16_4X4 4165,-7035 r0 top
U13 "ISD2130YYI" QFN20.4X4PAD 6007.5,-3352.5 r270 top
U14 "AD8538AUJZ" SOT23_5 6112.5,-4197.5 r180 top
U15 "AD8278ARZ" SO-8 5950,-3872.5 r270 top
U16 "SSM2305" LFCSP8 6050,-4502.5 r270 top
U17 "MAX1792EUA33" SSOP8 5640,-4927.5 r0 top
U18 "LTC3113IDHD" DFN16 4862.4,-5917.5 r270 top
U19 "LTC2953-1" DFN12 5532.5,-1710 r180 top
U20 "LTC2942IDCB" DFN6.2X3 3447.5,-5170 r90 top
U21 "MAX77757" 24L_FC2QFN 5022.5,-7005.2 r0 top
U22 "USB3740B" USB3740B 4765.1,-7152.6 r90 top
U23 "USB_C" 12401832E402A 4649.2,-7503 r0 top
U24 "ADF4360-0" LFCSP24 1368.8,-2531.3 r270 top
U25 "RFSA2023" HMC540 1280,-3575 r90 top
U26 "LEE2-6" MC1630 1100,-3562.5 r90 top
U27 "AD8310" MSO8 1415,-2945 r270 top
U28 "PSA-5451+" SOT_363 1675,-2907.5 r0 top
U29 "MAX2681" SOT23_6 972.5,-3002.5 r180 top
U30 "TYEAPLSANF-40.00" TCXO_520 1557.5,-2705 r0 top
U31 "ADP7102" LFCSP8 1722.5,-3382.5 r90 top
U32 "BGB741L7ESD" TSLP-7-1 932.5,-2405 r0 top
U34 "S25FL512S" SO16WB#2 5435,-4012.5 r0 bottom
U35 "LT1935" SOT23_5 6027.5,-5637.5 r180 top
Y1 "24MHZ" XTAL_ABM3 4607.5,-2920 r0 top
~FV1 "VIA5" VIA5 5000,-6900.2 r0 top
~FV2 "VIA5" VIA5 1695,-3215 r0 top
~FV3 "VIA5" VIA5 5255,-6860.2 r0 top
~FV4 "VIA5" VIA5 1200,-2690 r0 top
~FV5 "VIA5" VIA5 5217.5,-7080.2 r0 top
~FV6 "VIA5" VIA5 5437.5,-7622.5 r0 top
~FV7 "VIA5" VIA5 5240,-7035.2 r0 top
~FV8 "VIA5" VIA5 5350,-7035.2 r0 top
~FV9 "VIA5" VIA5 6020,-4547.5 r0 top
~FV10 "VIA5" VIA5 5872.5,-4037.5 r0 top
~FV11 "VIA5" VIA5 6287.5,-3820 r0 top
~FV12 "VIA5" VIA5 6180,-5600 r0 top
~FV13 "VIA5" VIA5 6090,-4570 r0 top
~FV14 "VIA5" VIA5 6142.5,-5460 r0 top
~FV15 "VIA5" VIA5 6215,-5460 r0 top
~FV16 "VIA5" VIA5 6312.5,-5952.5 r0 top
~FV17 "VIA5" VIA5 6115,-4557.5 r0 top
~FV18 "VIA5" VIA5 5890,-4532.5 r0 top
~FV19 "VIA5" VIA5 5820,-4582.5 r0 top
~FV20 "VIA5" VIA5 5852.5,-4582.5 r0 top
~FV21 "VIA5" VIA5 5927.5,-4645 r0 top
~FV22 "VIA5" VIA5 5890,-4645 r0 top
~FV23 "VIA5" VIA5 6060,-3417.5 r0 top
~FV24 "VIA5" VIA5 1277.5,-3012.5 r0 top
~FV25 "VIA5" VIA5 985,-2675 r0 top
~FV26 "VIA5" VIA5 4666.5,-1736 r0 top
~FV27 "VIA5" VIA5 4666.5,-1872.5 r0 top
~FV28 "VIA5" VIA5 6745,-2125 r0 top
~FV29 "VIA5" VIA5 1175,-2102.5 r0 top
~FV30 "VIA5" VIA5 1135,-2102.5 r0 top
~FV31 "VIA5" VIA5 1090,-2210 r0 top
~FV32 "VIA5" VIA5 1060,-2540 r0 top
~FV33 "VIA5" VIA5 885,-2642.5 r0 top
~FV34 "VIA5" VIA5 885,-2790 r0 top
~FV35 "VIA5" VIA5 885,-2667.5 r0 top
~FV36 "VIA5" VIA5 1035,-3165 r0 top
~FV37 "VIA5" VIA5 1007.5,-3412.5 r0 top
~FV38 "VIA5" VIA5 1100,-3320 r0 top
~FV39 "VIA5" VIA5 1712.5,-3335 r0 top
~FV40 "VIA5" VIA5 1750,-3422.5 r0 top
~FV41 "VIA5" VIA5 1370,-3527.5 r0 top
~FV42 "VIA5" VIA5 997.5,-3505 r0 top
~FV43 "VIA5" VIA5 997.5,-3567.5 r0 top
~FV44 "VIA5" VIA5 1400,-3595 r0 top
~FV45 "VIA5" VIA5 3920,-5217.5 r0 top
~FV46 "VIA5" VIA5 3855,-5217.5 r0 top
~FV47 "VIA5" VIA5 4992.4,-6247.5 r0 top
~FV48 "VIA5" VIA5 4182.5,-6927.5 r0 top
~FV49 "VIA5" VIA5 4920,-6907.7 r0 top
~FV50 "VIA5" VIA5 5307.5,-6942.7 r0 top
~FV51 "VIA5" VIA5 4122.5,-6927.5 r0 top
~FV52 "VIA5" VIA5 4352.5,-7050 r0 top
~FV53 "VIA5" VIA5 5300,-7205.2 r0 top
~FV54 "VIA5" VIA5 5307.5,-6942.7 r0 top
~FV55 "VIA5" VIA5 4122.5,-6927.5 r0 top
~FV56 "VIA5" VIA5 4182.5,-6987.5 r0 top
~FV57 "VIA5" VIA5 5175,-6790.2 r0 top
~FV58 "VIA5" VIA5 4897.4,-6247.5 r0 top
~FV59 "VIA5" VIA5 4995,-5287.5 r0 top
~FV60 "VIA5" VIA5 3405,-5080 r0 top
~FV61 "VIA5" VIA5 3405,-5080 r0 top
~FV62 "VIA5" VIA5 5505,-4980 r0 top
~FV63 "VIA5" VIA5 1400,-3625 r0 top
~FV64 "VIA5" VIA5 1395,-3447.5 r0 top
~FV65 "VIA5" VIA5 1712.5,-3335 r0 top
~FV66 "VIA5" VIA5 6060,-3417.5 r0 top
~FV67 "VIA5" VIA5 1597.5,-3210 r0 top
~FV68 "VIA5" VIA5 1062.5,-2160 r0 top
~FV69 "VIA5" VIA5 1062.5,-2160 r0 top
~FV70 "VIA5" VIA5 1062.5,-2132.5 r0 top
~FV71 "VIA5" VIA5 1175,-2102.5 r0 top
~FV72 "VIA5" VIA5 1135,-2127.5 r0 top
~FV73 "VIA5" VIA5 4847.5,-1872.5 r0 top
~FV74 "VIA5" VIA5 4847.5,-1736 r0 top
~FV75 "VIA5" VIA5 5550,-1637.5 r0 top
~FV76 "VIA5" VIA5 5550,-1637.5 r0 top
~FV77 "VIA5" VIA5 4882.5,-1567.5 r0 top
~FV78 "VIA5" VIA5 4927.5,-1567.5 r0 top
~FV79 "VIA5" VIA5 4877.5,-1510 r0 top
~FV80 "VIA5" VIA5 4637.5,-1510 r0 top
~FV81 "VIA5" VIA5 1247.5,-2160 r0 top
~FV82 "VIA5" VIA5 927.5,-2102.5 r0 top
~FV83 "VIA5" VIA5 885.5,-2414 r0 top
~FV84 "VIA5" VIA5 1797.5,-3382.5 r0 top
~FV85 "VIA5" VIA5 1577.5,-3595 r0 top
~FV86 "VIA7" VIA7 4897.4,-6107.5 r0 top
~FV87 "VIA5" VIA5 4427.5,-6985 r0 top
~FV88 "VIA5" VIA5 4587.5,-7210 r0 top
~FV89 "VIA5" VIA5 4617.5,-7210 r0 top
~FV90 "VIA5" VIA5 4527.5,-7210 r0 top
~FV91 "VIA5" VIA5 5400,-7205.2 r0 top
~FV92 "VIA5" VIA5 5450,-7205.2 r0 top
~FV93 "VIA5" VIA5 4427.5,-6985 r0 top
~FV94 "VIA5" VIA5 1400,-3625 r0 top
~FV95 "VIA5" VIA5 1302.5,-3622.5 r0 top
~FV96 "VIA5" VIA5 1750,-3622.5 r0 top
~FV97 "VIA5" VIA5 1797.5,-3327.5 r0 top
~FV98 "VIA5" VIA5 1597.5,-3210 r0 top
~FV99 "VIA5" VIA5 862.5,-2400 r0 top
~FV100 "VIA5" VIA5 1797.5,-3162.5 r0 top
~FV101 "VIA5" VIA5 1652.5,-3505 r0 top
~FV102 "VIA5" VIA5 4497.4,-6307.5 r0 top
~FV103 "VIA7" VIA7 4897.4,-6107.5 r0 top
~FV104 "VIA5" VIA5 4497.4,-5707.5 r0 top
~FV105 "VIA5" VIA5 5450,-7205.2 r0 top
~FV106 "VIA5" VIA5 5400.1,-7260.1 r0 top
~FV107 "VIA5" VIA5 5400.1,-7260.1 r0 top
~FV108 "VIA5" VIA5 4475,-7537.5 r0 top
~FV109 "VIA5" VIA5 4375,-7297.5 r0 top
~FV110 "VIA5" VIA5 4475,-7537.5 r0 top
~FV111 "VIA5" VIA5 3570,-7032.5 r0 top
~FV112 "VIA5" VIA5 3570,-6890 r0 top
~FV113 "VIA5" VIA5 3442.5,-7032.5 r0 top
~FV114 "VIA5" VIA5 3342.5,-7032.5 r0 top
~FV117 "VIA5" VIA5 6010,-6120 r0 top
~FV118 "VIA5" VIA5 5940,-6120 r0 top
~FV119 "VIA5" VIA5 5880,-6120 r0 top
~FV120 "VIA5" VIA5 4122.5,-6987.5 r0 top
~FV121 "VIA5" VIA5 5350.1,-7260.1 r0 top

## Footprints (in the part's own frame and the unit in brackets; to place one, negate y for a bottom-side part, rotate by r counter-clockwise, add the part's x,y. Pads: shape width x height; smd on the part's side, far side on the other; paste and mask are expansions set on the pad)
2CON50R [mil]
  rect 35x35 hole 20: 1(-50,0)
  round 35 hole 20: 2(0,0)
2CON79R [mil]
  rect 50x50 hole 31: 1(79,0)
  round 50 hole 31: 2(0,0)
  silkscreen extent -40,0 118,272
2CON100R [mil]
  rect 65x65 hole 42: 1(100,0)
  round 65 hole 42: 2(0,0)
  silkscreen extent -50,-400 150,-50
2SIP100 [mil]
  rect 65x65 hole 46: 1(0,0)
  round 65 hole 46: 2(100,0)
  silkscreen extent -50,-50 150,50
5CON50R [mil]
  rect 35x35 hole 20: 1(0,0)
  round 35 hole 20: 2(50,0) 3(100,0) 4(150,0) 5(200,0)
  silkscreen extent -55,-176 255,41
8CON50 [mil]
  rect 35x35 hole 20: 1(0,0)
  round 35 hole 20: 2(50,0) 3(100,0) 4(150,0) 5(200,0) 6(250,0) 7(300,0) 8(350,0)
  silkscreen extent -55,-45 405,81
24L_FC2QFN [mil]
  rect 17.7x7.8 smd: 1(0,0) 2(0,-15.8) 3(0,-31.5) 4(0,-47.3) 5(0,-63) 6(0,-78.8) 13(124,-78.8) 14(124,-63) 15(124,-47.3) 16(124,-31.5) 17(124,-15.8) 18(124,0)
  rect 7.8x17.7 smd: 7(22.6,-101.4) 8(38.4,-101.4) 9(54.1,-101.4) 10(69.9,-101.4) 11(85.6,-101.4) 12(101.4,-101.4) 19(101.4,22.6) 20(85.6,22.6) 21(69.9,22.6) 22(54.1,22.6) 23(38.4,22.6) 24(22.6,22.6)
  Top Layer lines w1: 8.3,-19.2 13.8,-19.2 ccw(c13.8,-15.8) 17.2,-15.8 ccw(c13.8,-15.8) 13.8,-12.4 8.3,-12.4 ; 8.5,3.4 10.8,3.4 15.2,-0.4 15.2,-3.4 8.6,-3.4 ; 8.6,-66.4 13.8,-66.4 ccw(c13.8,-63) 17.2,-63 ccw(c13.8,-63) 13.8,-59.6 8.6,-59.6 ; 8.6,-43.9 13.8,-43.9 cw(c13.8,-47.3) 17.2,-47.3 cw(c13.8,-47.3) 13.8,-50.7 8.7,-50.7 ; 8.6,-34.9 13.8,-34.9 ccw(c13.8,-31.5) 17.2,-31.5 ccw(c13.8,-31.5) 13.8,-28.1 8.6,-28.1 ; 8.7,-75.4 15.2,-75.4 15.2,-78.4 10.8,-82.2 8.8,-82.2 ; 19.2,-93.3 19.2,-91.1 23.5,-86.2 26,-86.2 26,-92.8 ; 19.2,14 19.2,12.8 23.6,8.4 33,8.4 33,-6.9 ccw(c36.4,-6.9) 36.4,-10.3 38.4,-10.3 ccw(c38.4,-6.9) 41.8,-6.9 41.8,13.9 ; 25.9,31 34.8,31 ; 35,-92.6 35,-87.7 cw(c38.4,-87.7) 38.4,-84.3 cw(c38.4,-87.7) 41.8,-87.7 41.8,-92.7 ; 50.7,-92.7 50.7,-62 cw(c54.1,-62) 54.1,-58.6 cw(c54.1,-62) 57.5,-62 57.5,-92.7 ; 50.7,13.9 50.7,-6.9 ccw(c54.1,-6.9) 54.1,-10.3 ccw(c54.1,-6.9) 57.5,-6.9 57.5,13.9 ; 66.5,-92.7 66.5,-87.6 cw(c69.9,-87.6) 69.9,-84.2 cw(c69.9,-87.6) 73.3,-87.6 73.3,-92.6 ; 66.5,17.4 66.5,-6.9 ccw(c69.9,-6.9) 69.9,-10.3 85.6,-10.3 ccw(c85.6,-6.9) 89,-6.9 89,13.9 ; 73.3,31 82.1,31 ; 82.2,-92.8 82.2,-87.6 cw(c85.6,-87.6) 85.6,-84.2 cw(c85.6,-87.6) 89,-87.6 89,-92.7 ; 98,-92.8 98,-86.2 101,-86.2 104.8,-90.6 104.8,-92.8 ; 98,14.2 98,-0.4 ccw(c101,-0.4) 101,-3.4 115.4,-3.4 ; 104.8,13.9 104.8,13.5 114.9,3.4 115.6,3.4 ; 115.3,-19.2 110.2,-19.2 cw(c110.2,-15.8) 106.8,-15.8 cw(c110.2,-15.8) 110.2,-12.4 115.4,-12.4 ; 115.4,-82.2 114.2,-82.2 107.8,-75.8 107.8,-68.4 74.4,-68.4 cw(c74.4,-65.4) 71.4,-65.4 71.4,-62.6 cw(c74.4,-62.6) 74.4,-59.6 115.6,-59.6 ; 115.6,-50.7 74.4,-50.7 cw(c74.4,-47.7) 71.4,-47.7 71.4,-44.9 cw(c74.4,-44.9) 74.4,-41.9 107.8,-41.9 107.8,-31.1 cw(c110.8,-31.1) 110.8,-28.1 115.6,-28.1 ; 132.3,-75.2 132.3,-66.5 ; 132.3,-43.8 132.3,-34.9
  Top Layer lines w2.5: 8.6,-47.2 14,-47.3 ; 8.6,-45.1 14.7,-45.3 15.9,-46.6 15.5,-48.1 14.4,-49.2 9.2,-49.3 ; 8.8,-65.1 14.4,-65.1 15.6,-63.8 15.8,-62.3 15,-61.3 8.9,-61.1 ; 8.8,-15.9 13.7,-15.9 ; 8.9,-63.3 14.4,-63.4 ; 8.9,-31.5 13.9,-31.5 ; 8.9,-29.5 14.9,-29.7 15.9,-30.9 15.3,-32.8 14.1,-33.5 9,-33.5 ; 8.9,-17.9 13.8,-17.8 14.9,-17.5 15.8,-15.6 15.2,-14 9.2,-13.8 ; 9,-76.8 14,-76.7 13.8,-77.9 10.4,-80.8 9.3,-80.9 9.3,-78.9 11.1,-78.2 ; 9.1,2 10.2,1.9 13.7,-0.8 13.8,-2.1 9.6,-2.2 9.4,0 10.9,-0.6 ; 20.3,-91.8 23.9,-87.6 24.6,-87.5 24.5,-92.3 22.4,-92.2 23.2,-90.4 ; 23.9,11.6 35.6,11 ; 27.2,15.2 27.1,29.7 33.8,29.7 33.8,14.9 29.2,15 29.2,28 31.6,28 31.4,16.4 ; 36,-92.3 36.3,-86.8 37.5,-85.8 38.6,-85.4 39.9,-86.1 40.3,-87.4 40.3,-92.4 ; 36.4,11.6 36.4,-6.7 38.2,-6.5 38.7,12.9 20.3,13.4 23.9,9.8 33,9.7 34.2,9.2 34.4,-7.3 35.6,-8.7 38,-8.8 39.5,-8.6 40.4,-7.1 40.4,13.2 ; 38,-92.7 38.3,-87.2 ; 51.9,-92.4 52,-61.7 52.9,-60.2 54.3,-59.9 55.9,-60.9 55.9,-62.1 56,-92.6 ; 52,13.4 52.2,-7.6 53,-8.6 54.4,-8.7 55.8,-7.9 56.2,-6.6 56.2,13.3 54.1,13.2 54,-6.9 ; 53.9,-92.6 54,-61.5 ; 67.6,-92.2 68.1,-86.6 69.2,-85.7 70.4,-85.7 71.9,-86.4 71.9,-92.3 ; 67.6,13.4 67.8,-7.7 69.6,-8.9 85.8,-8.9 87.5,-7.4 87.8,12.9 69.6,13 69.9,-6.8 85.5,-6.9 85.7,11.1 71.6,11 72,-4.9 83.7,-4.9 83.6,9.2 73.6,9.1 74,-2.9 81.7,-2.9 81.4,7.2 75.6,7.2 76.1,-0.9 79.5,-0.9 79.1,5.4 77.4,5.2 77.8,0 ; 69.8,-87.8 69.9,-92.9 ; 74.6,14.9 74.7,29.8 81,29.8 81,14.7 76.5,14.7 76.7,28 78.9,27.9 78.8,16.1 ; 83.4,-92.5 83.5,-87.2 84.4,-85.9 85.7,-85.6 86.9,-86.2 87.6,-87.2 87.5,-92.1 ; 85.5,-87.6 85.6,-92.3 ; 99.3,-92.1 99.4,-87.3 100.6,-87.5 103.2,-90.9 103.3,-92.1 101.3,-92.1 100.8,-90 ; 103.9,6.1 105,3.7 108.4,3.6 102.9,8.9 103.2,2 112.2,1.7 103,10.9 101.2,10.9 101.3,0.1 114.4,0 114.3,2.4 103.6,12.9 99.2,13 99.2,-0.7 100.6,-2.1 115.3,-2 ; 109.7,-15.9 115.4,-15.9 ; 110.8,-75.7 110.9,-65.8 ; 112.6,-77.6 112.5,-65.2 74.8,-64.9 74.4,-62.9 113.1,-63.3 ; 113.2,-46.2 112.7,-31.3 111.4,-31.2 111.4,-43.4 111.5,-45.1 74.9,-45.4 74.7,-47.3 112.4,-47.2 114.3,-47.5 114.4,-29.5 110.4,-29.4 109.2,-30.9 109.1,-43.4 74.2,-43.4 72.8,-44.5 72.7,-46.7 72.9,-48.4 74,-49.3 115.6,-49.3 ; 114.6,-62.1 114.8,-80.7 112.6,-78.7 109.1,-75.2 109.1,-68.4 108.8,-67.1 74.4,-67 73,-66.2 72.8,-64.3 72.7,-62.2 73.9,-61 115.6,-60.9 ; 115.1,-13.9 109.2,-14 108.2,-15.4 108.3,-17 109.3,-17.8 115.4,-17.8 ; 115.7,-36 131.2,-36.2 131.1,-42.7 116.3,-42.6 116.2,-38.2 129.4,-38.2 129.3,-40.5 117.6,-40.4 ; 116,-67.8 131.3,-67.7 131.2,-74.1 116.5,-74.3 116.5,-69.9 129.5,-69.9 129.6,-72.1 117.5,-72.2
  silkscreen extent 3,-98 121,20
0402N#1 [mil]
  rect 31.5x25 smd: 1(0,0) 2(-47.2,0)
0402N#2 [mil]
  rect 31.5x25 smd: 1(0,0) 2(47.2,0)
  silkscreen extent 20,0 27,0
0603N#1 [mil]
  rect 38x30 smd: 1(-6,0) 2(69,0)
0603N#2 [mil]
  rect 38x30 smd: 1(-6,0) 2(-81,0)
0603N#3 [mil]
  rect 38x30 smd: 1(6,0) 2(-69,0)
  silkscreen extent -46,0 -30,0
0603N#4 [mil]
  rect 38x30 smd: 1(6,0) 2(81,0)
  silkscreen extent 30,0 46,0
1206 [mil]
  rect 60x60 smd: 1(0,0) 2(-125,0)
1812 [mil]
  rect 60x125 smd: 1(-192.5,0) 2(7.5,0)
  silkscreen extent -242,-83 43,83
2220 [mil]
  rect 75x200 smd: 1(0,0) 2(-250,0)
  silkscreen extent -308,-120 58,120
12401832E402A [mil]
  rect 11.8x27.6 smd: A1(0,0) A2(19.7,0) A3(39.4,0) A4(59.1,0) A5(78.8,0) A6(98.5,0) A7(118.2,0) A8(137.9,0) A9(157.6,0) A10(177.3,0) A11(197,0) A12(216.7,0) B1(206.8,-66.9) B2(187.1,-66.9) B3(167.4,-66.9) B4(147.7,-66.9) B5(128,-66.9) B6(108.3,-66.9) B7(88.6,-66.9) B8(68.9,-66.9) B9(49.2,-66.9) B10(29.5,-66.9) B11(9.8,-66.9) B12(-9.9,-66.9)
  round 25.6 hole 25.6: Hole1(-33.4,-26)
  round 37.4 hole 37.4: Hole2(250,-26)
  round 60 hole 43.3: S1(-54.3,-75.2) S3(285.1,-309.5) S4(-68.5,-309.5)
  round 55 hole 43.3: S2(270.9,-75.2)
  silkscreen extent -73,-404 289,10
CMT-1604 [mil]
  rect 138x138 smd: 1(0,0) 2(688,0)
  silkscreen extent 29,-315 659,315
CONN_FFC22 [mil]
  rect 23.6x74.8 smd: 1(0,0) 2(-39.4,0) 3(-78.8,0) 4(-118.2,0) 5(-157.6,0) 6(-197,0) 7(-236.4,0) 8(-275.8,0) 9(-315.2,0) 10(-354.6,0) 11(-394,0) 12(-433.4,0) 13(-472.8,0) 14(-512.2,0) 15(-551.6,0) 16(-591,0) 17(-630.4,0) 18(-669.8,0) 19(-709.2,0) 20(-748.6,0) 21(-788,0) 22(-827.4,0)
  rect 82.7x110.2 smd: 23(-951.4,92.5) 24(124,92.5)
CONN_UMCX [mil]
  rect 41x39 smd: 1(60.5,57)
  rect 87x41 smd: 2(0,0) 3(0,116)
  silkscreen extent -61,-26 61,142
DFN6.2X3 [mil]
  rect 10x27.6 smd: 1(0,0) 2(19.7,0) 3(39.4,0) 4(39.4,112.4) 5(19.7,112.4) 6(0,112.4)
  rect 53.2x65 smd: 7(19.7,56.2)
  silkscreen extent -20,-23 59,115
DFN12 [mil]
  oval 9.8x27.6 smd: 1(0,-114) 2(17.7,-114) 3(35.4,-114) 4(53.1,-114) 5(70.8,-114) 6(88.5,-114) 7(88.5,0) 8(70.8,0) 9(53.1,0) 10(35.4,0) 11(17.7,0) 12(0,0)
  rect 93.7x65 smd: 13(44.3,-57)
  silkscreen extent -15,-116 103,2
DFN16 [mil]
  rect 9.8x27.6 smd: 1(0,150) 2(-19.7,150) 3(-39.4,150) 4(-59.1,150) 5(-78.7,150) 6(-98.4,150) 7(-118.1,150) 8(-137.8,150) 9(-137.8,0) 10(-118.1,0) 11(-98.4,0) 12(-78.7,0) 13(-59.1,0) 14(-39.4,0) 15(-19.7,0) 16(0,0)
  rect 171x96 smd: 17(-68.9,75)
  silkscreen extent -167,-4 30,154
DO_216AA [mil]
  rect 100x105 smd: 1(0,0)
  rect 30x50 smd: 2(-90,0.1)
  silkscreen extent -170,-58 43,123
HMC540 [mil]
  oval 11x40 smd: 1(-1.3,-140.6) 2(18.4,-140.6) 3(38.1,-140.6) 4(57.8,-140.6) 9(59.1,0) 10(39.4,0) 11(19.7,0) 12(0,0)
  oval 40x11 smd: 5(98.5,-99.8) 6(98.5,-80.1) 7(98.5,-60.4) 8(98.5,-40.7) 13(-41.9,-40.7) 14(-41.9,-60.4) 15(-41.9,-80.1) 16(-41.9,-99.8)
  Top Layer lines w1: -10.2,-31.8 -10.2,-108.8 66.8,-108.8 66.8,-31.8 -10.2,-31.8
  Top Layer lines w2.5: -9,-107.7 -9,-32.9 65.7,-32.9 65.7,-107.8 -8.4,-107.8
  Top Layer lines w10: -1.8,-103.1 61.8,-103.1 61.8,-37.4 -5.4,-37.4 -5.4,-103.9
  Top Layer lines w25: 28,-69.3 28,-91.1 48.3,-91.1 48.3,-49 8.1,-49 8.1,-93.2
  silkscreen extent -42,-140 98,0
IND_CD43 [mil]
  rect 177x69 smd: 1(0,0) 2(0,-128)
  silkscreen extent -94,-168 94,40
IND_IHLP [mil]
  rect 135x95 smd: 1(0,0) 2(0,-230)
  silkscreen extent -128,-242 128,12
IND_SRP [mil]
  rect 94x59 smd: 1(0,0) 2(0,137)
  silkscreen extent -80,-19 80,156
JUMPER [mil]
  rect 65x65 hole 40: 1(0,0)
  round 65 hole 40: 2(100,0)
  silkscreen extent -50,-50 150,50
LED_550 [mil]
  round 65 hole 43: 1(0,0) 2(100,0)
  silkscreen extent -75,-458 175,150
LFCSP8 [mil]
  oval 38x12 smd: 1(0,19.7) 2(0,0) 3(0,-19.6) 4(0,-39.3) 5(119.8,-39.3) 6(119.8,-19.6) 7(119.8,0) 8(119.8,19.7)
  rect 60x73 smd: 9(59.9,-9.8)
  silkscreen extent 1,-69 119,49
LFCSP24 [mil]
  oval 11x29.7 smd: 1(0,-156.3) 2(19.7,-156.3) 3(39.4,-156.3) 4(59.1,-156.3) 5(78.8,-156.3) 6(98.5,-156.3) 13(98.5,0) 14(78.8,0) 15(59.1,0) 16(39.4,0) 17(19.7,0) 18(0,0)
  oval 29.7x11 smd: 7(127.4,-127.4) 8(127.4,-107.7) 9(127.4,-88) 10(127.4,-68.3) 11(127.4,-48.6) 12(127.4,-28.9) 19(-28.8,-28.9) 20(-28.8,-48.6) 21(-28.8,-68.3) 22(-28.8,-88) 23(-28.8,-107.7) 24(-28.8,-127.4)
  Top Layer lines w1: 6.4,-127.8 -0.3,-127.8 -0.3,-35.1 ; 6.2,-127.8 98.9,-127.8 98.9,-121.2 ; 98.9,-121.3 98.9,-35.1 ; 98.9,-35.2 98.9,-28.6 92.3,-28.6 ; -0.3,-35.2 -0.3,-28.6 6.4,-28.6 ; 92.4,-28.6 6.2,-28.6
  Top Layer lines w2.5: 0.8,-126.7 97.6,-126.7 97.6,-29.6 0.8,-29.6 0.8,-126.2 ; 7.2,-120.1 91.2,-120.1 91.2,-36.2 7.2,-36.2 7.2,-119.5
  Top Layer lines w10: 5.3,-122.5 93,-122.5 93,-34.1 4.9,-34.1 4.9,-121.8 ; 11.3,-116 87.1,-116 87.1,-40.5 11.4,-40.5 11.4,-114.3 11.5,-114.3
  Top Layer lines w25: 23.3,-104.4 75.2,-104.4 75.2,-54.1 24,-54.1 24,-84.9 55,-84.9 55,-73.7 41.3,-73.7
  silkscreen extent -30,-157 128,1
MC1630 [mil]
  rect 12x31 smd: 1(0,0) 2(26,0) 3(52,0) 4(52,75) 5(26,75) 6(0,75)
  rect 23x26 smd: 7(26,37.5)
  Top Layer lines w1: 14.6,50.4 1.6,50.4 1.6,37.5 14.5,24.6 14.8,24.6 ; 37.4,50.4 50.4,50.4 50.4,24.6 37.4,24.6 ; 15,50 2.1,50 2.1,37.7 14.7,25.1 ; 37.2,50 50,50 50,25 37,25
  Top Layer lines w2.5: 38,48.9 48.7,48.9 48.7,26.3 37.9,26.3 ; 14.8,48.7 3.3,48.7 3.3,38.3 15,26.6
  Top Layer lines w5: 37.4,45.5 46.4,45.5 46.4,29.3 38.9,29.3 38.9,42.1 42.1,42.1 42.1,32.7 ; 9.9,42.9 9.9,39.8 13.2,36.5 13.2,45.6 5.9,45.6 5.9,40 15.8,30.1
  silkscreen extent -14,-2 66,77
MSO8 [mil]
  oval 13x70 smd: 1(0,-200) 2(25.6,-200) 3(51.2,-200) 4(76.8,-200) 5(76.8,0) 6(51.2,0) 7(25.6,0) 8(0,0)
  silkscreen extent -25,-163 100,-38
MTHole3 [mil]
  round 120 hole 120: MTHole3(0,0)
MTHole4 [mil]
  round 120 hole 120: MTHole4(0,0)
MTHole5 [mil]
  round 120 hole 120: MTHole5(0,0)
MTHole6 [mil]
  round 120 hole 120: MTHole6(0,0)
MTHole7 [mil]
  round 375 hole 375: MTHole7(0,0)
MTHole8 [mil]
  round 375 hole 375: MTHole8(0,0)
NINA-B221 [mil]
  rect 45.3x27.6 smd: 1(0,0) 2(0,-39.4) 3(0,-78.7) 4(0,-118.1) 5(0,-157.4) 6(0,-196.8) 7(0,-236.1) 8(0,-275.5) 9(0,-314.8) 10(0,-354.2) 16(325,-354.2) 17(325,-314.8) 18(325,-275.5) 19(325,-236.1) 20(325,-196.8) 21(325,-157.4) 22(325,-118.1) 23(325,-78.7) 24(325,-39.4) 25(325,0)
  rect 27.6x45.3 smd: 11(83.8,-351.4) 12(123.1,-351.4) 13(162.5,-351.4) 14(201.9,-351.4) 15(241.2,-351.4) 26(241.2,-2.9) 27(201.9,-2.9) 28(162.5,-2.9) 29(123.1,-2.9) 30(83.8,-2.9)
  rect 27.6x27.6 smd: 31(53.2,-57) 32(96.5,-57) 33(139.8,-57) 34(183.1,-57) 35(226.4,-57) 36(269.7,-57) 37(185.2,-109.4) 38(139.8,-109.4) 39(230.4,-154.1) 40(185.2,-154.7) 41(139.8,-154.7) 42(94.6,-154.7) 43(185.2,-200) 44(139.8,-200) 45(230.4,-245.3) 46(185.2,-245.3) 47(139.8,-245.3) 48(94.6,-245.3)
  silkscreen extent -34,-520 359,32
NN01-004 [mil]
  rect 51.2x94.4 smd: 1(0,0) 2(200.8,0)
  Top Layer lines w1: -24.7,8 -88.6,8 -88.6,-177 -72.9,-177 -72.9,-7.7 -24.4,-7.7
  Top Layer lines w2.5: -25.1,6.7 -87.4,6.7 -87.4,-175.8 -74.1,-175.8 -74.1,-6.2 -24.9,-6.2
  Top Layer lines w5: -80.8,-171.7 -80.8,0.2 -23.4,0.2 -23.4,-3.1 -76.8,-3.1 -76.8,-173.2 -84.5,-173.2 -84.5,3.9 -24.3,3.9
  silkscreen extent -38,-59 238,59
QFN16_4X4 [mil]
  rect 31x12 smd: 1(-89.3,114.9) 2(-89.3,89.3) 3(-89.3,63.7) 4(-89.3,38.1) 9(63.7,38.1) 10(63.7,63.7) 11(63.7,89.3) 12(63.7,114.9)
  rect 12x31 smd: 5(-51.2,0) 6(-25.6,0) 7(0,0) 8(25.6,0) 13(25.6,153) 14(0,153) 15(-25.6,153) 16(-51.2,153)
  Top Layer lines w1: -65.3,24 39.7,24 39.7,129 -65.3,129 -65.3,24
  Top Layer lines w2.5: -64.2,128 -64.2,24.9 38.5,24.9 38.5,128 -64,128
  Top Layer lines w10: -60.2,124 -60.2,29.3 34.2,29.3 34.2,123.2 -56.6,123.2
  Top Layer lines w20: -49.7,112.5 -49.7,39.6 22.9,39.6 22.9,113.5 -34.7,113.5 -34.7,54.3 6.6,54.3 6.6,99.1 -19.7,99.1 -19.7,68.4 -6.5,68.4 -6.5,91.4
  silkscreen extent -92,-2 66,155
QFN20.4X4 [mil]
  rect 11.8x28.7 smd: 1(0,0) 2(19.7,0) 3(39.4,0) 4(59.1,0) 5(78.8,0) 11(78.8,154.8) 12(59.1,154.8) 13(39.4,154.8) 14(19.7,154.8) 15(0,154.8)
  rect 28.7x11.8 smd: 6(116.8,38) 7(116.8,57.7) 8(116.8,77.4) 9(116.8,97.1) 10(116.8,116.8) 16(-38,116.8) 17(-38,97.1) 18(-38,77.4) 19(-38,57.7) 20(-38,38)
  rect 98x98 smd: 21(39.4,77.4)
  silkscreen extent -39,-1 118,156
QFN20.4X4PAD [mil]
  rect 11.8x28.7 smd: 1(0,0) 2(19.7,0) 3(39.4,0) 4(59.1,0) 5(78.8,0) 11(78.8,154.8) 12(59.1,154.8) 13(39.4,154.8) 14(19.7,154.8) 15(0,154.8)
  rect 28.7x11.8 smd: 6(116.8,38) 7(116.8,57.7) 8(116.8,77.4) 9(116.8,97.1) 10(116.8,116.8) 16(-38,116.8) 17(-38,97.1) 18(-38,77.4) 19(-38,57.7) 20(-38,38)
  rect 82.7x82.7 smd: 21(39.4,77.4)
  silkscreen extent -39,-1 118,156
QFP100-4 [mil]
  oval 60x10 smd: 1(0,0) 2(0,-19.7) 3(0,-39.4) 4(0,-59.1) 5(0,-78.8) 6(0,-98.5) 7(0,-118.2) 8(0,-137.9) 9(0,-157.6) 10(0,-177.3) 11(0,-197) 12(0,-216.7) 13(0,-236.4) 14(0,-256.1) 15(0,-275.8) 16(0,-295.5) 17(0,-315.2) 18(0,-334.9) 19(0,-354.6) 20(0,-374.3) 21(0,-394) 22(0,-413.7) 23(0,-433.4) 24(0,-453.1) 25(0,-472.8) 51(610,-472.8) 52(610,-453.1) 53(610,-433.4) 54(610,-413.7) 55(610,-394) 56(610,-374.3) 57(610,-354.6) 58(610,-334.9) 59(610,-315.2) 60(610,-295.5) 61(610,-275.8) 62(610,-256.1) 63(610,-236.4) 64(610,-216.7) 65(610,-197) 66(610,-177.3) 67(610,-157.6) 68(610,-137.9) 69(610,-118.2) 70(610,-98.5) 71(610,-78.8) 72(610,-59.1) 73(610,-39.4) 74(610,-19.7) 75(610,0)
  oval 10x60 smd: 26(68.6,-541.4) 27(88.3,-541.4) 28(108,-541.4) 29(127.7,-541.4) 30(147.4,-541.4) 31(167.1,-541.4) 32(186.8,-541.4) 33(206.5,-541.4) 34(226.2,-541.4) 35(245.9,-541.4) 36(265.6,-541.4) 37(285.3,-541.4) 38(305,-541.4) 39(324.7,-541.4) 40(344.4,-541.4) 41(364.1,-541.4) 42(383.8,-541.4) 43(403.5,-541.4) 44(423.2,-541.4) 45(442.9,-541.4) 46(462.6,-541.4) 47(482.3,-541.4) 48(502,-541.4) 49(521.7,-541.4) 50(541.4,-541.4) 76(541.4,68.6) 77(521.7,68.6) 78(502,68.6) 79(482.3,68.6) 80(462.6,68.6) 81(442.9,68.6) 82(423.2,68.6) 83(403.5,68.6) 84(383.8,68.6) 85(364.1,68.6) 86(344.4,68.6) 87(324.7,68.6) 88(305,68.6) 89(285.3,68.6) 90(265.6,68.6) 91(245.9,68.6) 92(226.2,68.6) 93(206.5,68.6) 94(186.8,68.6) 95(167.1,68.6) 96(147.4,68.6) 97(127.7,68.6) 98(108,68.6) 99(88.3,68.6) 100(68.6,68.6)
  silkscreen extent -10,-550 620,75
RC0805#1 [mil]
  rect 60x55 smd: 1(0,0) 2(90,0)
  silkscreen extent 40,-27 50,27
RC0805#2 [mil]
  rect 60x55 smd: 1(0,0) 2(-90,0)
RC1206#1 [mil]
  rect 64x63 smd: 1(0,0) 2(-135,0)
RC1206#2 [mil]
  rect 64x63 smd: 1(0,0) 2(135,0)
SAW_TB0505A#1 [mil]
  rect 67x39 smd: 1(0,0) 2(0,-100) 3(0,-200) 4(0,-300) 7(197,-300) 8(197,-200) 9(197,-100) 10(197,0)
  rect 39x67 smd: 5(48.5,-396) 6(148.5,-396) 11(148.5,96) 12(48.5,96)
  silkscreen extent -15,-425 212,125
SAW_TB0505A#2 [mil]
  rect 67x39 smd: 1(0,0) 2(0,100) 3(0,200) 4(0,300) 7(-197,300) 8(-197,200) 9(-197,100) 10(-197,0)
  rect 39x67 smd: 5(-48.5,396) 6(-148.5,396) 11(-148.5,-96) 12(-48.5,-96)
SC70_5 [mil]
  oval 13x40 smd: 1(-51.2,-82) 2(-25.6,-82) 3(0,-82) 4(0,0) 5(-51.2,0)
  silkscreen extent -85,-63 33,-19
SMA_EDGE [mil]
  rect 80x200 smd: 1(0,0)
  rect 60x200 smd: 2(-167.5,0) 3(167.5,0)
  rect 60x200 smd far side: 4(-167.5,0) 5(167.5,0)
  silkscreen extent -212,-125 212,475
SMP6-RGB [mil]
  rect 55x79 smd: 1(0,0) 2(0,-173) 5(142,0) 6(142,-173)
  rect 39x79 smd: 3(71,0) 4(71,-173)
  silkscreen extent -32,-186 174,12
SMT-0940 [mil]
  rect 126x78.8 smd: 1(0,0) 2(0,354.4)
  silkscreen extent -177,0 177,354
SO16WB#1 [mil]
  oval 75x24 smd: 1(0,0) 2(0,-50) 3(0,-100) 4(0,-150) 5(0,-200) 6(0,-250) 7(0,-300) 8(0,-350) 9(375,-350) 10(375,-300) 11(375,-250) 12(375,-200) 13(375,-150) 14(375,-100) 15(375,-50) 16(375,0)
  silkscreen extent 60,-375 316,25
SO16WB#2 [mil]
  oval 75x24 smd: 1(0,0) 2(0,50) 3(0,100) 4(0,150) 5(0,200) 6(0,250) 7(0,300) 8(0,350) 9(-375,350) 10(-375,300) 11(-375,250) 12(-375,200) 13(-375,150) 14(-375,100) 15(-375,50) 16(-375,0)
SO-8 [mil]
  rect 25x80 smd: 1(0,0) 2(50,0) 3(100,0) 4(150,0) 5(150,220) 6(100,220) 7(50,220) 8(0,220)
  silkscreen extent -15,55 165,175
SOD323 [mil]
  rect 25x40 smd: 1(88,0) 2(0,0)
  silkscreen extent 8,-27 80,27
SOT23 [mil]
  rect 36x36 smd: 1(11,0) 2(86,0)
  rect 36x50 smd: 3(49,80)
  silkscreen extent 0,25 100,75
SOT23_5 [mil]
  rect 40x27 smd: 1(0,0) 2(0,-37.5) 3(0,-75) 4(102,-75) 5(102,0)
  silkscreen extent 25,-100 75,25
SOT23_6 [mil]
  oval 24x60 smd: 1(-37.5,-122) 2(0,-122) 3(37.5,-122)
  oval 22x60 smd: 4(37.5,0) 5(0,0) 6(-37.5,0)
  silkscreen extent -59,-96 59,-26
SOT_363 [mil]
  rect 16.5x23.6 smd: 1(-26,-94.2) 2(0,-94.2) 3(26,-94.2) 4(26,0) 5(0,0) 6(-26,0)
  silkscreen extent -46,-78 46,-16
SSOP8 [mil]
  oval 13x70 smd: 1(0,-230) 2(25.6,-230) 3(51.2,-230) 4(76.8,-230) 5(76.8,0) 6(51.2,0) 7(25.6,0) 8(0,0)
  silkscreen extent -25,-175 100,-50
ST-0402S [mil]
  rect 35.4x70.8 smd: 1(0,0) 2(137.8,0)
  silkscreen extent -10,-79 148,79
SW_400A [mil]
  round 65 hole 43: 1(0,-200) 2(100,-200) 3(200,-200) 4(200,0) 5(0,0)
  silkscreen extent -191,-200 391,511
TA0281A [mil]
  rect 23.6x31.5 smd: 1(-50,0) 4(50,88.5) 5(0,88.5) 6(-50,88.5)
  rect 23.6x33.5 smd: 2(0,0) 3(50,0)
  Top Layer lines w5: -50,42.9 -40.7,33.6 -40.7,13.6 ; -50,42.8 -59.3,33.5 -59.3,13.5 ; -49.8,37.5 -55.1,32.2 -55.1,16.9 -44.8,16.9 -44.8,31.8 -47.6,34.6 -51.1,31.1 -51.1,20.6 -47.9,20.6 -47.9,29.6
  silkscreen extent -66,-20 66,108
TCXO_520 [mil]
  rect 20x24 smd: 1(0,0) 2(77,-0.6) 3(77,53) 4(0,53)
  silkscreen extent -14,-17 91,69
TestPoint1 [mil]
  round 100 hole 60: TestPoint1(0,0)
TestPoint2 [mil]
  round 100 hole 60: TestPoint2(0,0)
TestPoint3 [mil]
  round 100 hole 60: TestPoint3(0,0)
TestPoint4 [mil]
  round 100 hole 60: TestPoint4(0,0)
TestPoint5 [mil]
  round 100 hole 60: TestPoint5(0,0)
TestPoint6 [mil]
  round 100 hole 60: TestPoint6(0,0)
TestPoint7 [mil]
  round 100 hole 60: TestPoint7(0,0)
TestPoint8 [mil]
  round 100 hole 60: TestPoint8(0,0)
TestPoint9 [mil]
  round 100 hole 60: TestPoint9(0,0)
TestPoint10 [mil]
  round 100 hole 60: TestPoint10(0,0)
TestPoint11 [mil]
  round 100 hole 60: TestPoint11(0,0)
TestPoint12 [mil]
  round 100 hole 60: TestPoint12(0,0)
TestPoint13 [mil]
  round 50 smd: TestPoint13(0,0)
TestPoint14 [mil]
  round 50 smd: TestPoint14(0,0)
TestPoint15 [mil]
  round 50 smd: TestPoint15(0,0)
TestPoint16 [mil]
  round 50 smd: TestPoint16(0,0)
TestPoint17 [mil]
  round 50 smd: TestPoint17(0,0)
TestPoint18 [mil]
  round 50 smd: TestPoint18(0,0)
TSLP-7-1 [mil]
  rect 11.8x7.8 smd: 1(21.6,0) 2(0,0) 3(-21.6,0) 4(-21.6,-67) 5(0,-67) 6(21.6,-67)
  rect 55x43.4 smd: 7(0,-33.5)
  silkscreen extent -26,-73 26,6
TSTPT5#1 [mil]
  oval 60x10 smd: 1(0,0)
TSTPT5#2 [mil]
  round 62 hole 40: 1(0,0)
TSTPT5#3 [mil]
  rect 38x30 smd: 1(6,0)
TSTPT5#4 [mil]
  rect 30x50 smd: 1(0,0)
TSTPT5#5 [mil]
  rect 40x50 smd: 1(0,0)
TSTPT5#6 [mil]
  rect 38x30 smd: 1(-6,0)
TSTPT5#7 [mil]
  round 45 hole 30: 1(0,0)
UBLOX_NEO-7N [mil]
  rect 31.5x70.8 smd: 1(0,0) 2(43.3,0) 3(86.6,0) 4(129.9,0) 5(173.2,0) 6(216.5,0) 7(259.8,0) 8(377.8,0) 9(421.1,0) 10(464.4,0) 11(507.7,0) 12(551,0) 13(551,472.2) 14(507.7,472.2) 15(464.4,472.2) 16(421.1,472.2) 17(377.8,472.2) 18(259.8,472.2) 19(216.5,472.2) 20(173.2,472.2) 21(129.9,472.2) 22(86.6,472.2) 23(43.3,472.2) 24(0,472.2)
  silkscreen extent -39,-4 590,476
USB3740B [mil]
  oval 11.8x42.3 smd: 1(0,0) 2(19.6,0) 6(19.6,52.4) 7(0,52.4)
  oval 32.5x11.8 smd: 3(50.2,6.5) 4(50.2,26.2) 5(50.2,45.9) 8(-31.6,45.9) 9(-31.6,26.2) 10(-31.6,6.5)
  silkscreen extent -32,-28 51,58
VIA5 [mil]
  round 20 hole 10: FV(0,0)
VIA7 [mil]
  round 20 hole 10: FV(0,0)
XTAL_ABM3 [mil]
  rect 70x100 smd: 1(0,0) 2(160,0)
  silkscreen extent -18,-65 178,65

## Via types
v1: diameter 20, hole 10, Top Layer to Bottom Layer, 1334 vias